# Altium PCB ads1299.PcbDoc (part 1 of 2)
Units mil, origin at the board's own origin, x right, y up, seen from the top; angles counter-clockwise.
Board outline 3937.01 x 3937.01 mil, 4 copper layers (Top Layer, internal_Layer 1, Internal_Layer 2, Bottom Layer), stack 23.756 mil thick; 175 components, 124 nets, 575 pads, 101 vias.
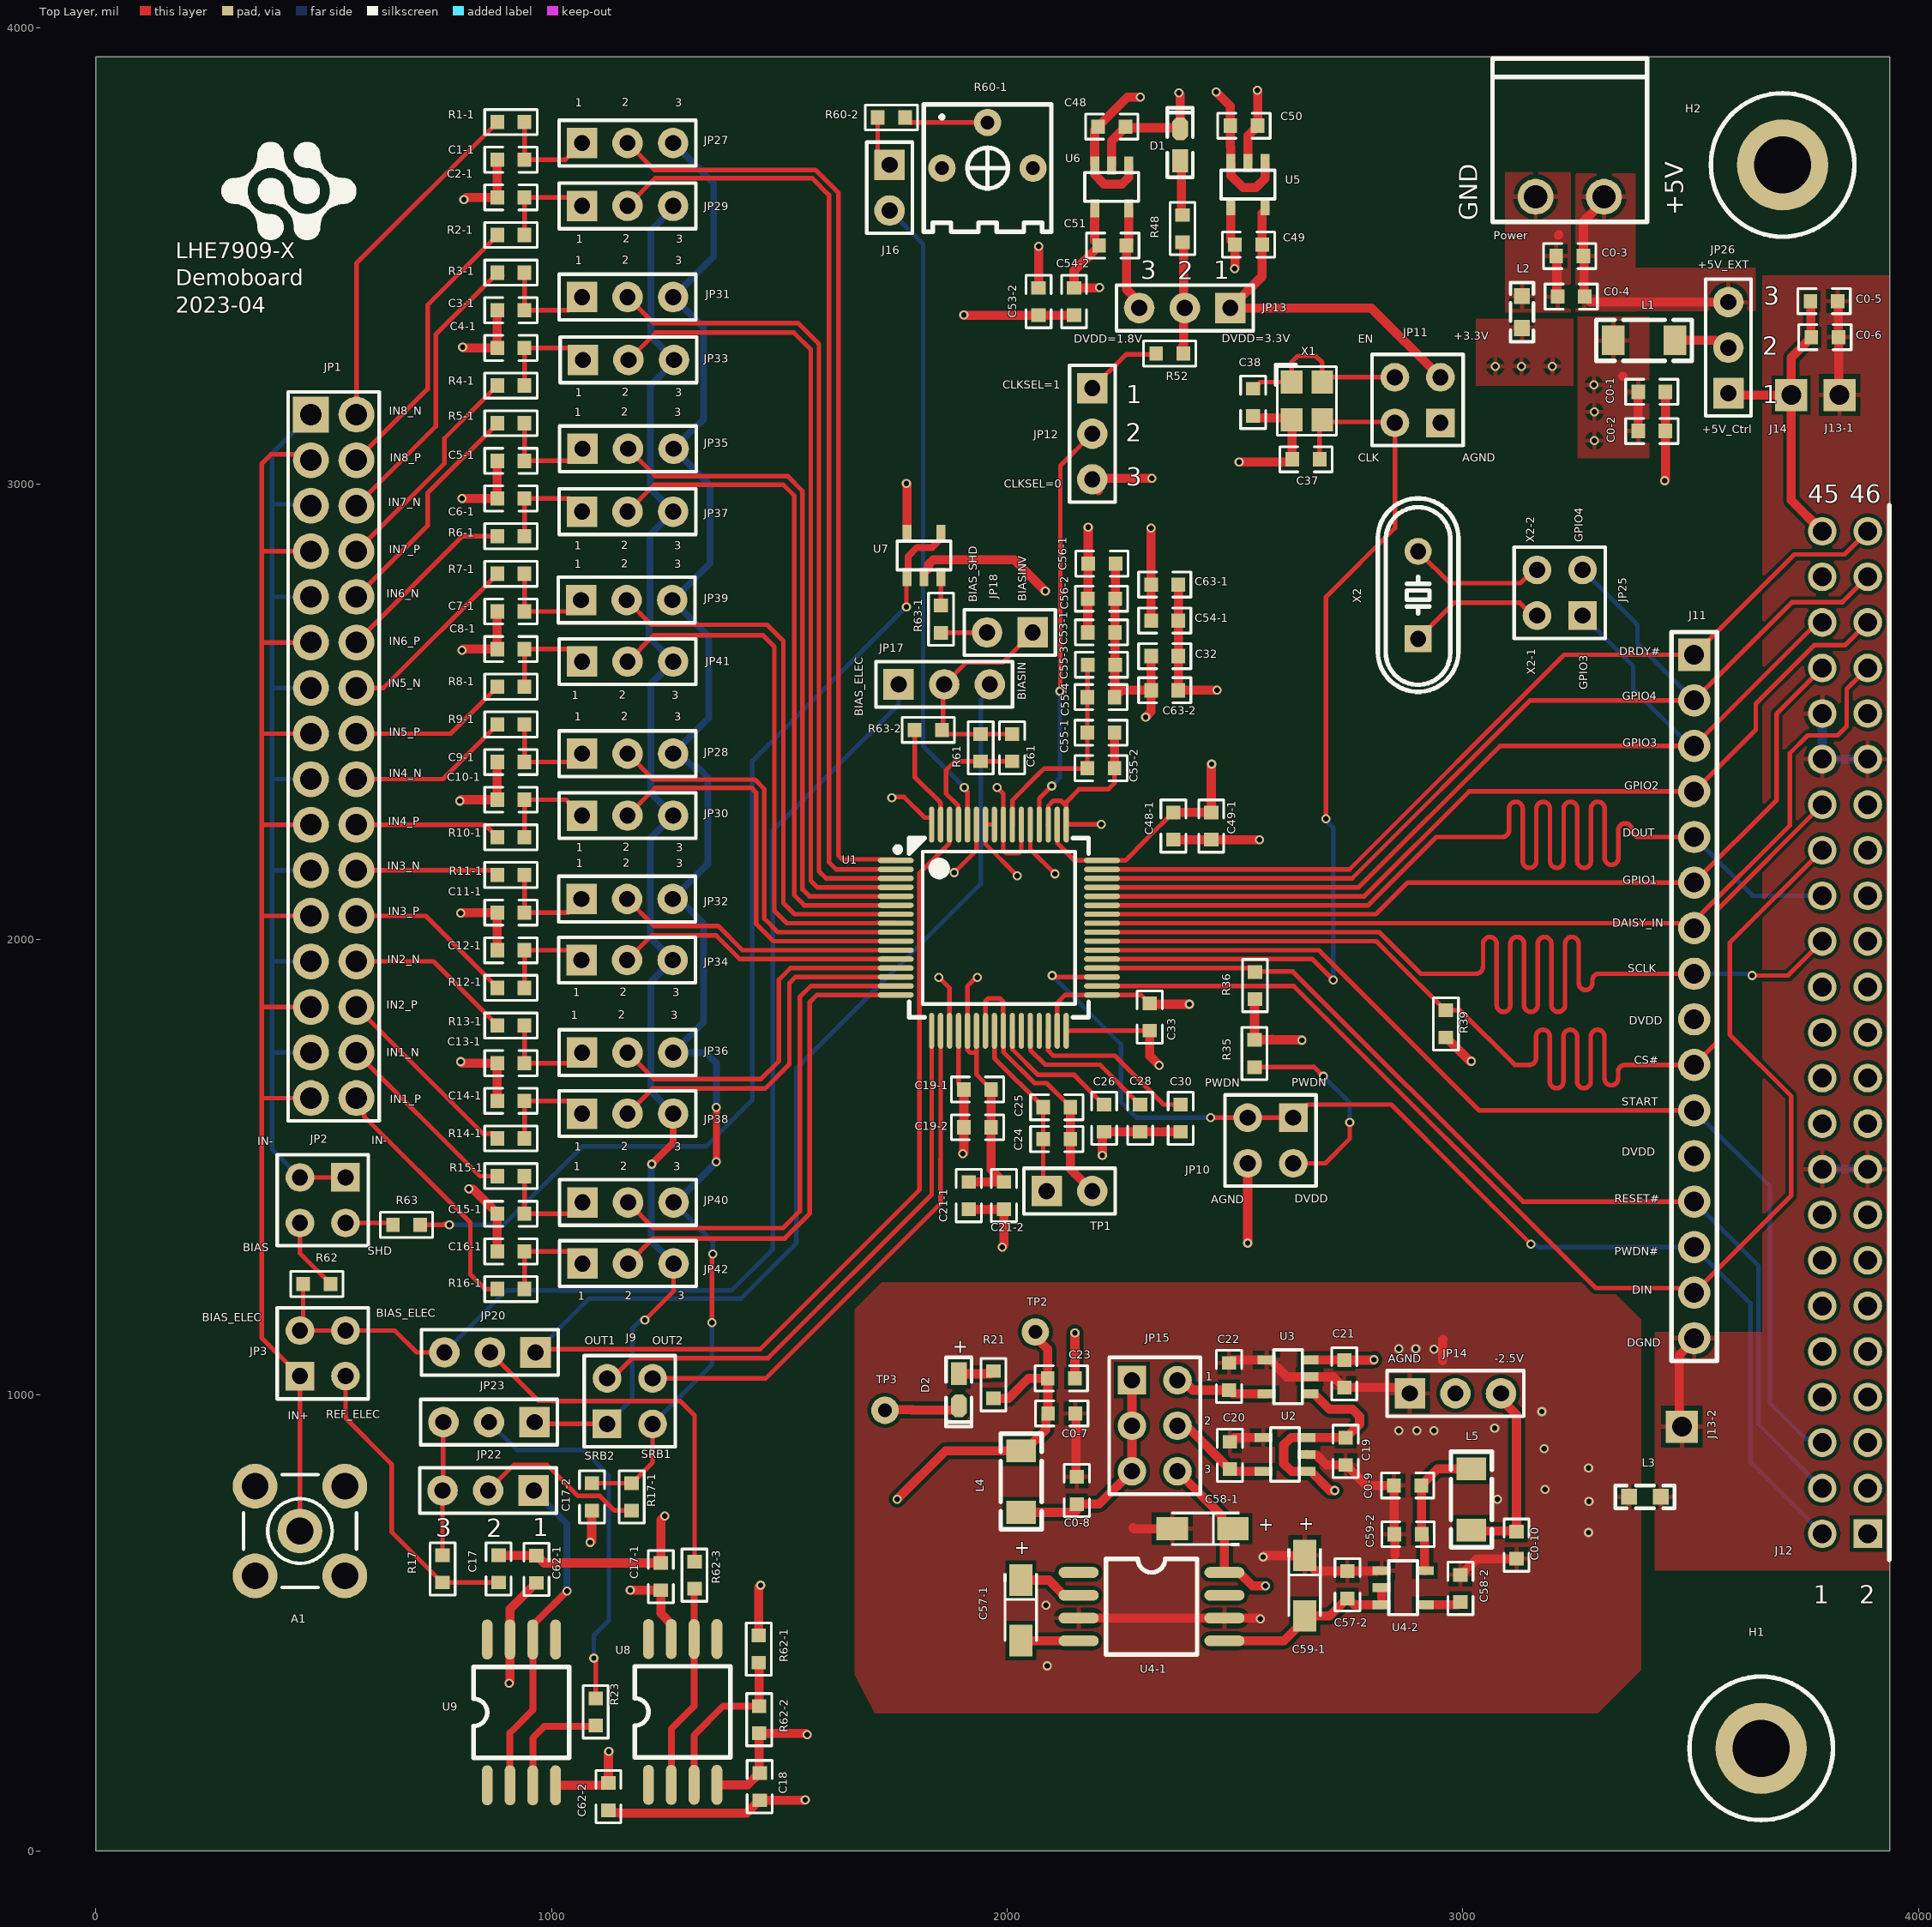
[diagram p0: Top Layer view]
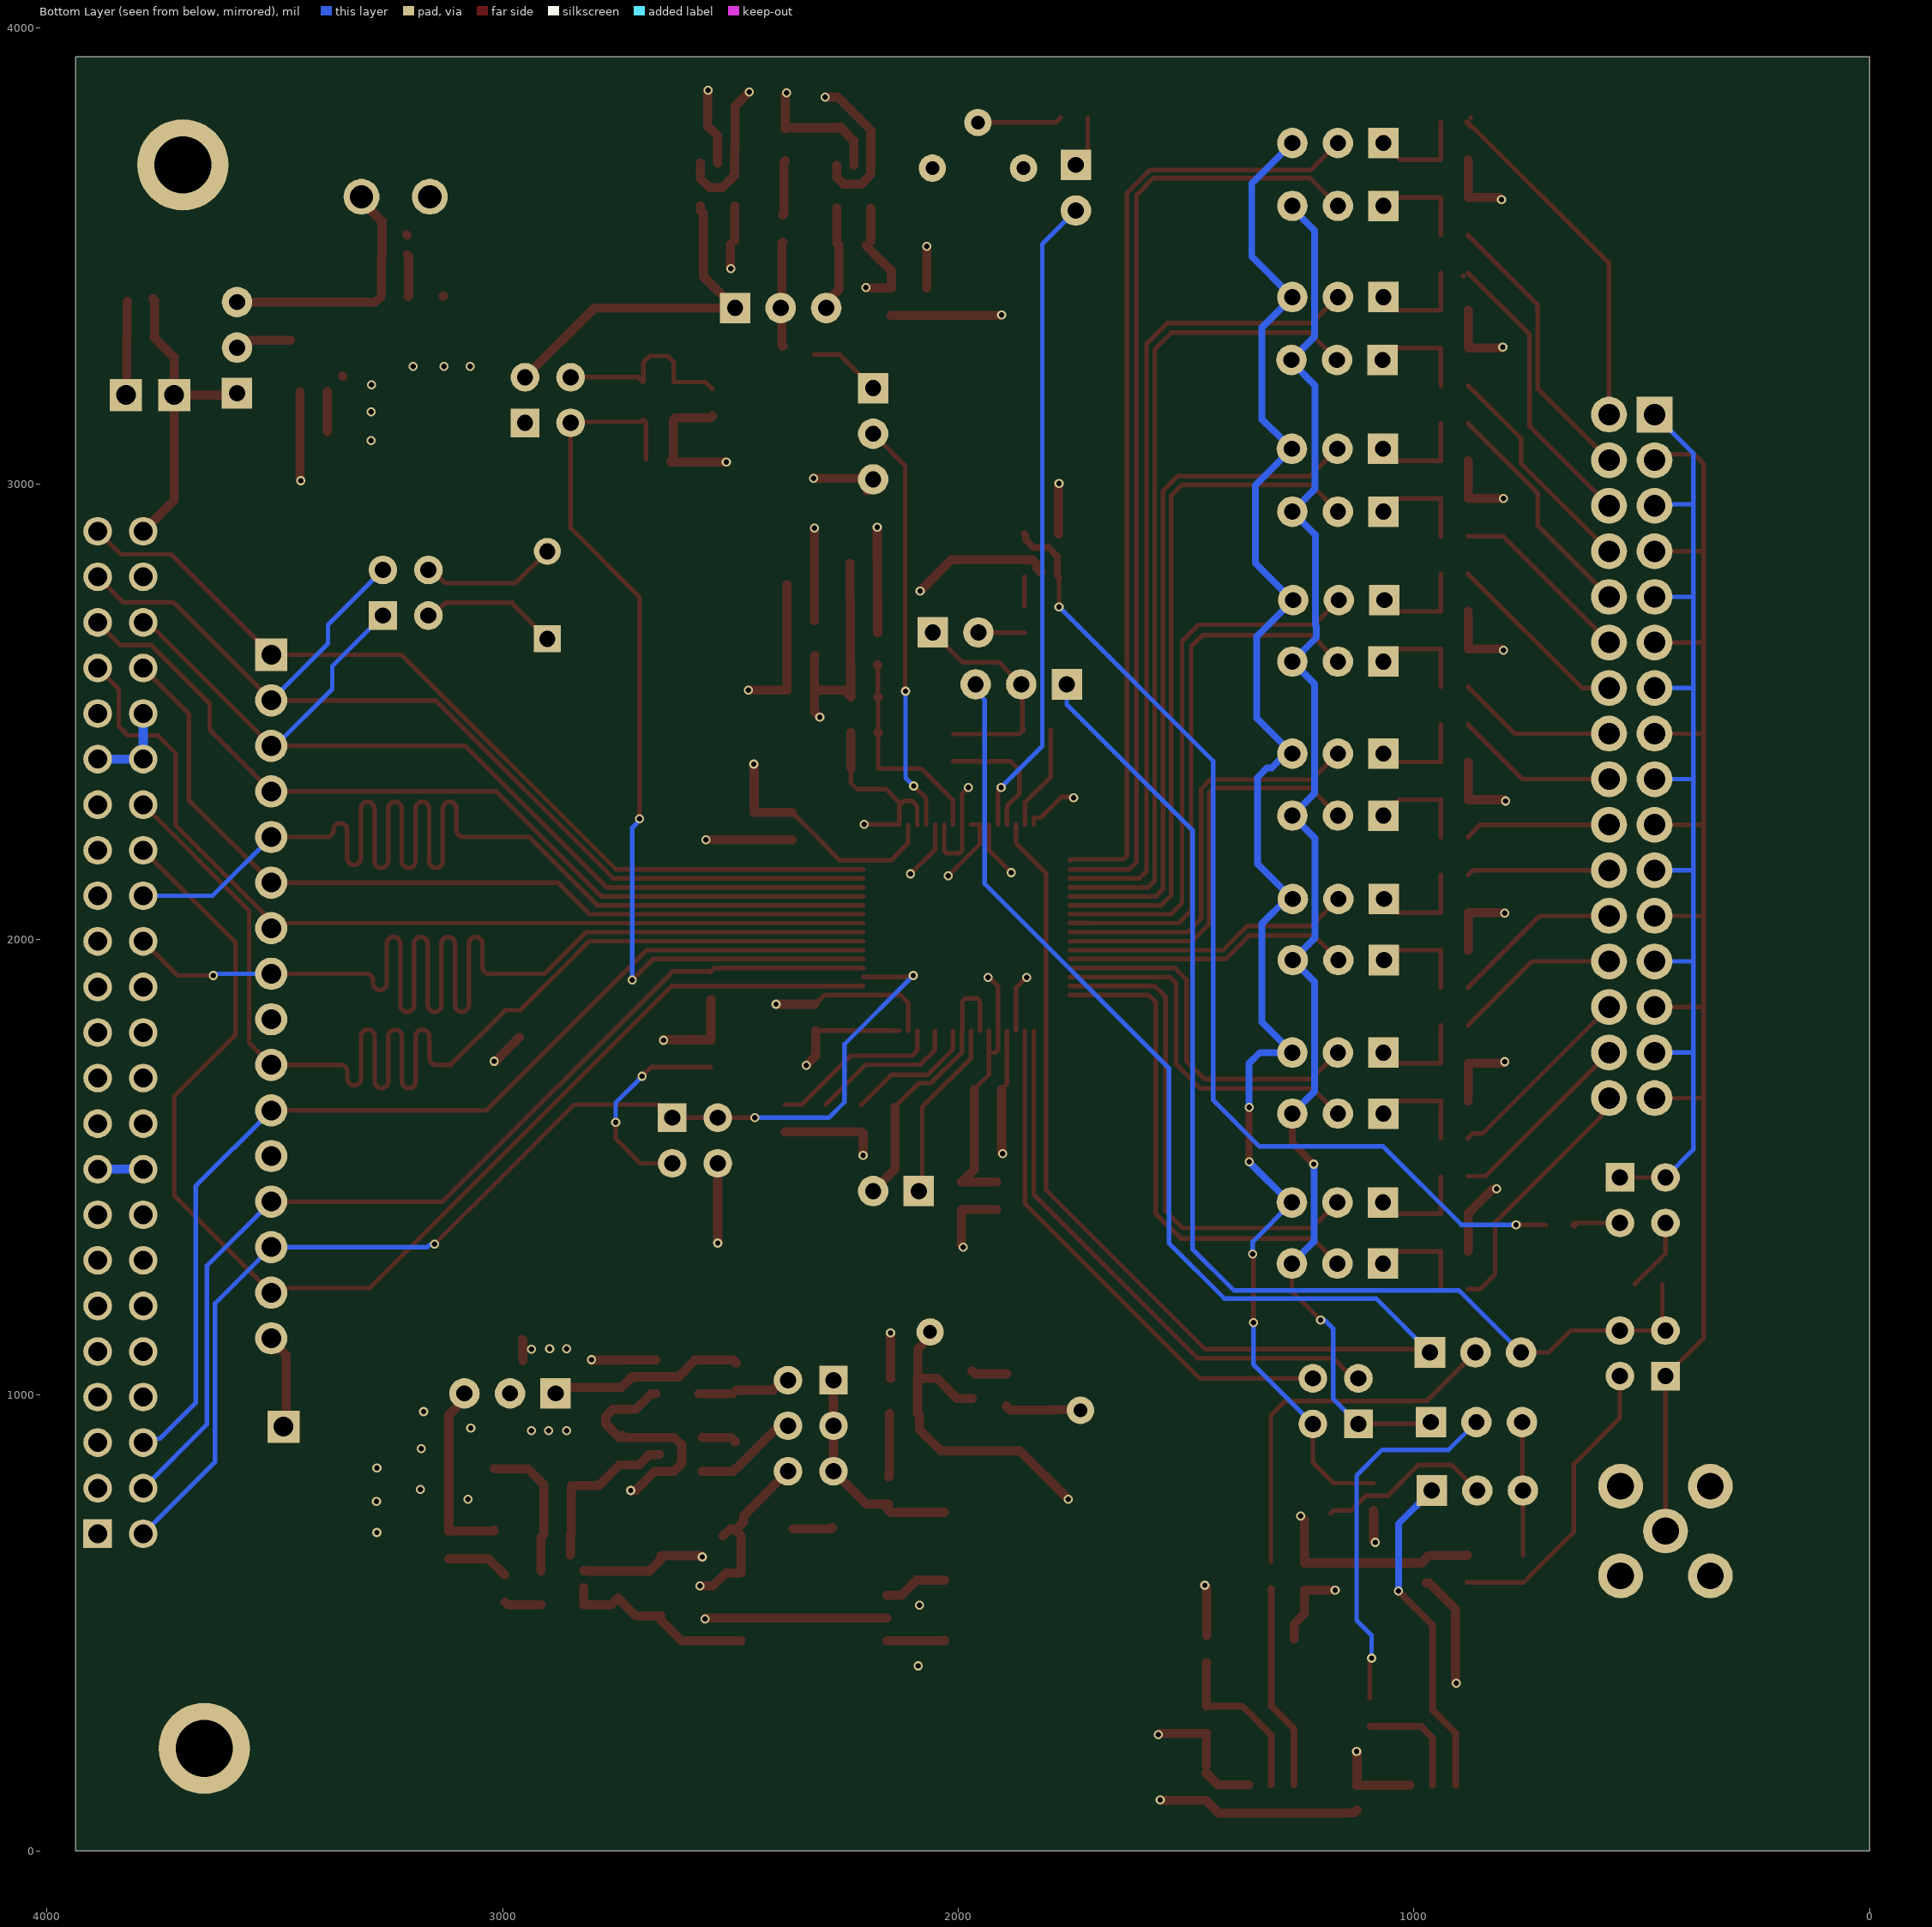
[diagram p1: Bottom Layer view, seen from below]
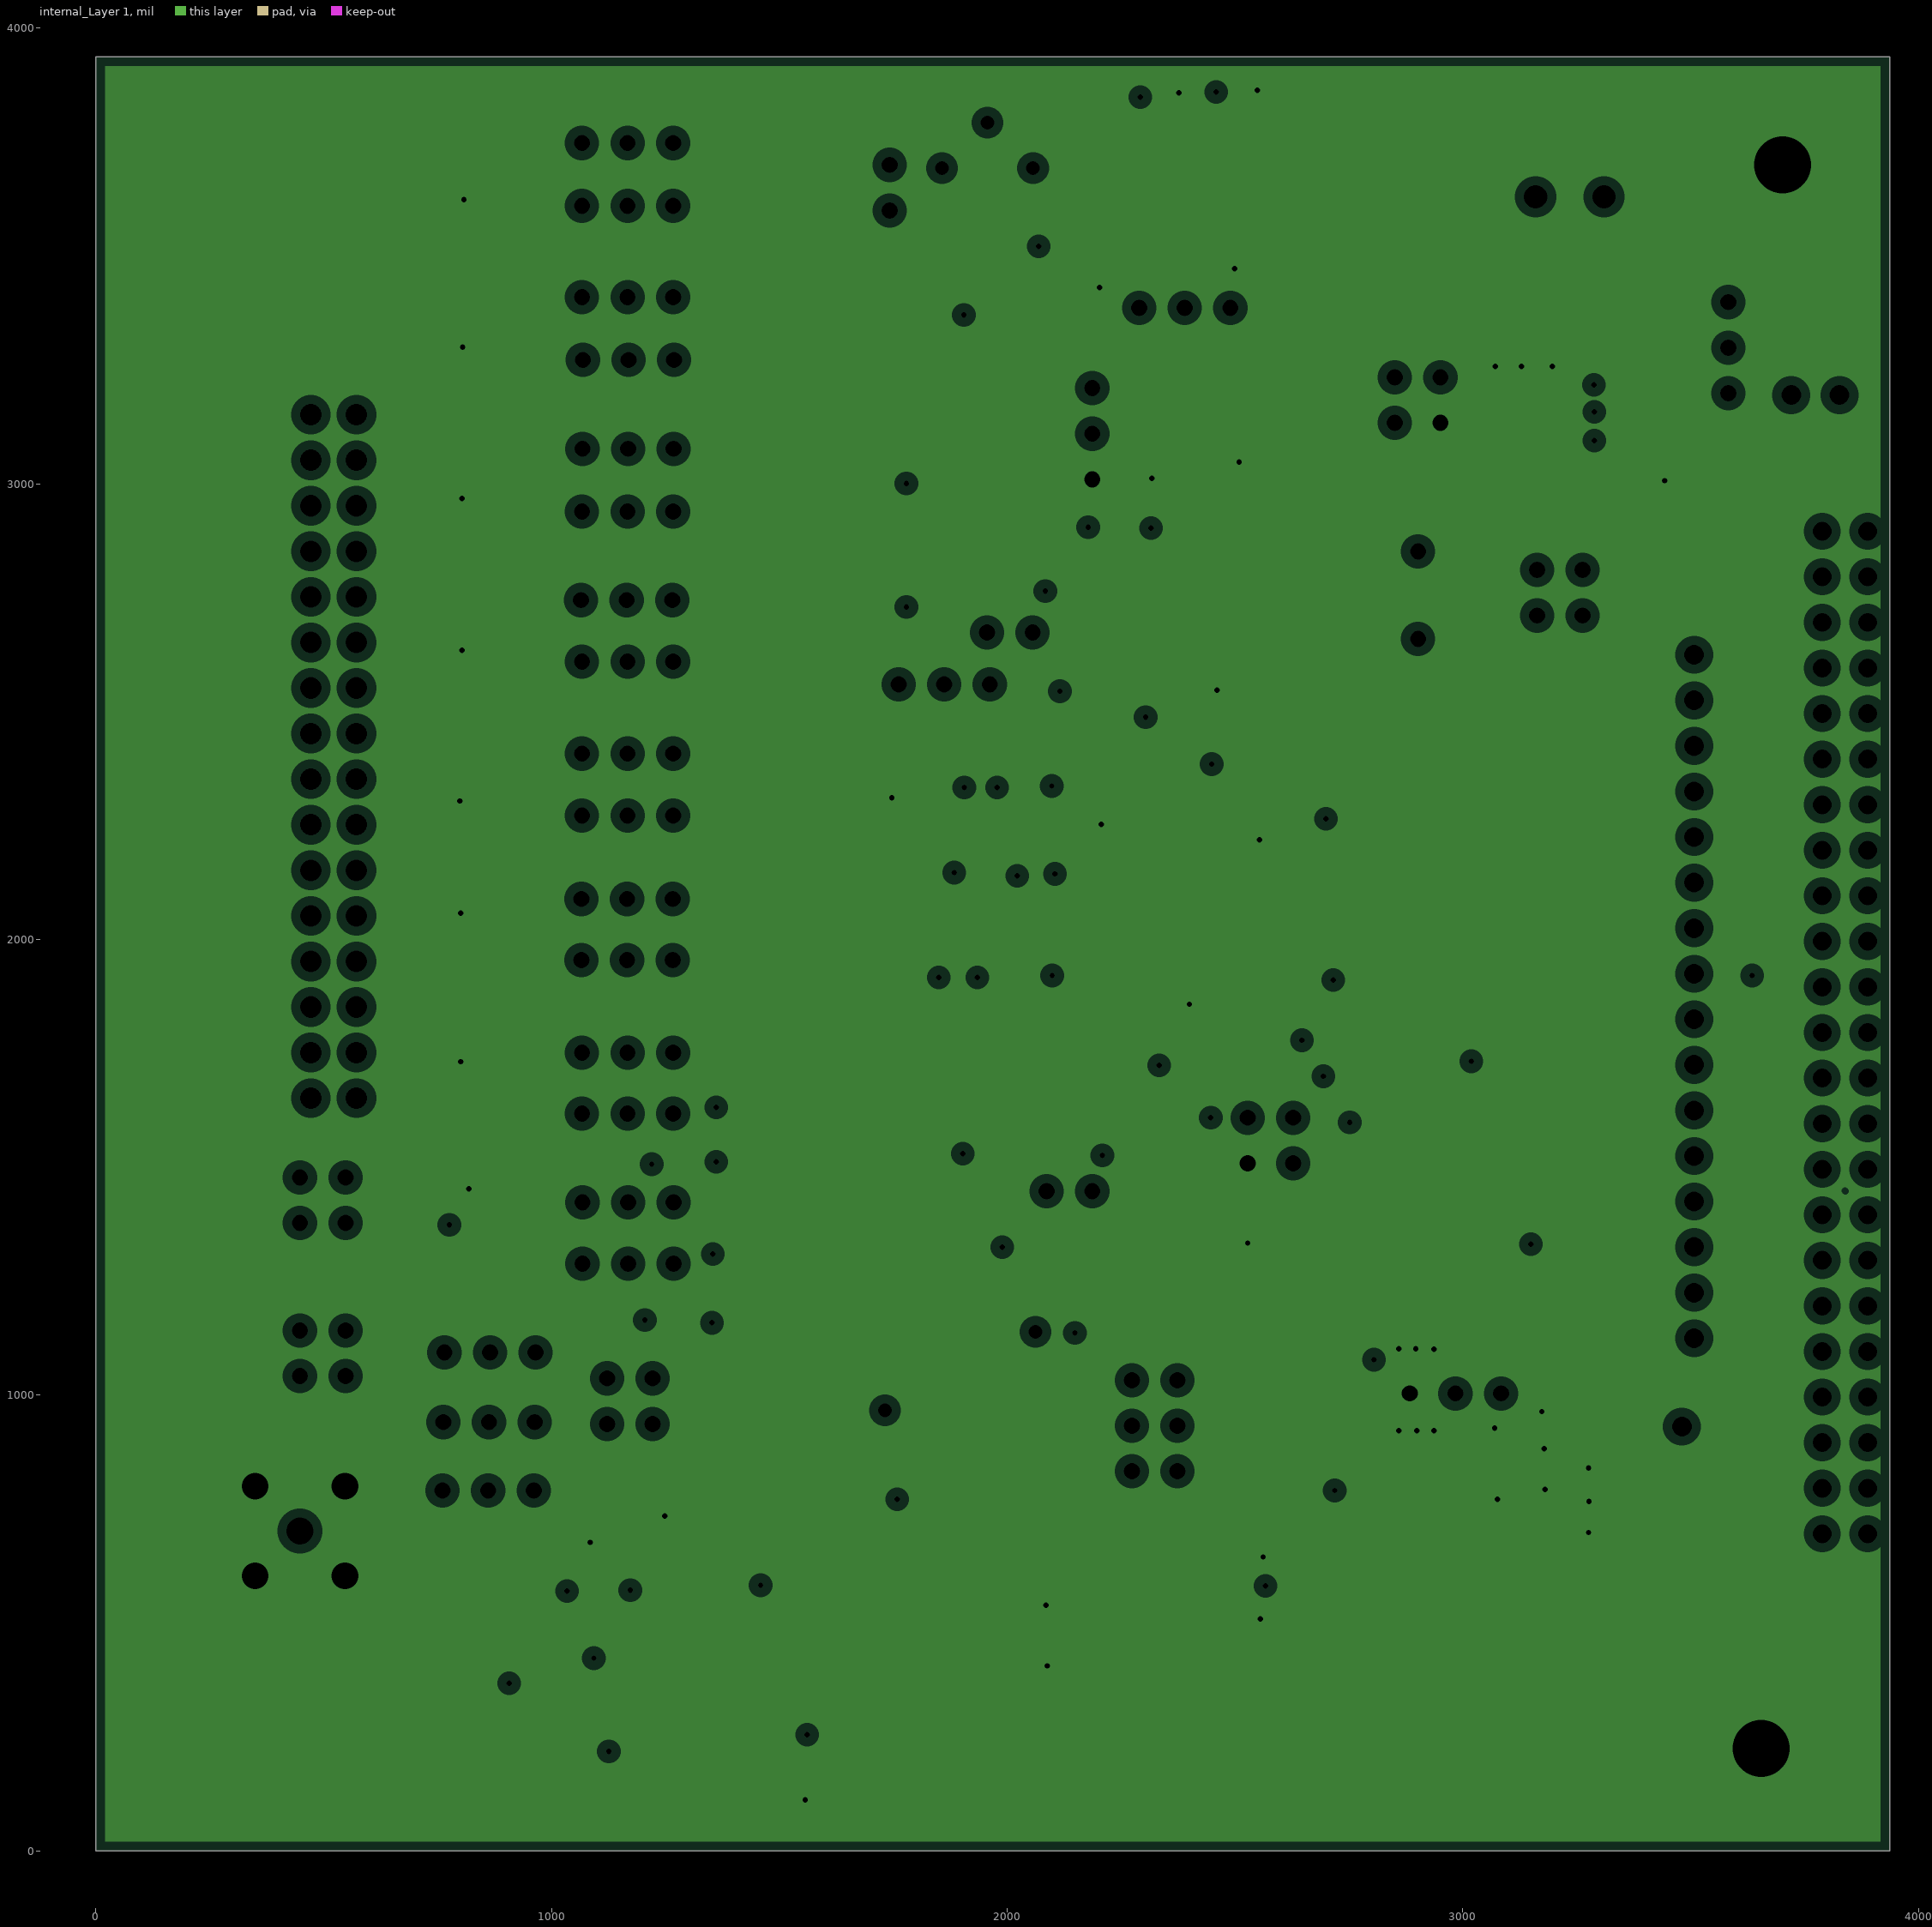
[diagram p2: internal_Layer 1, clearances drawn from the general rule]
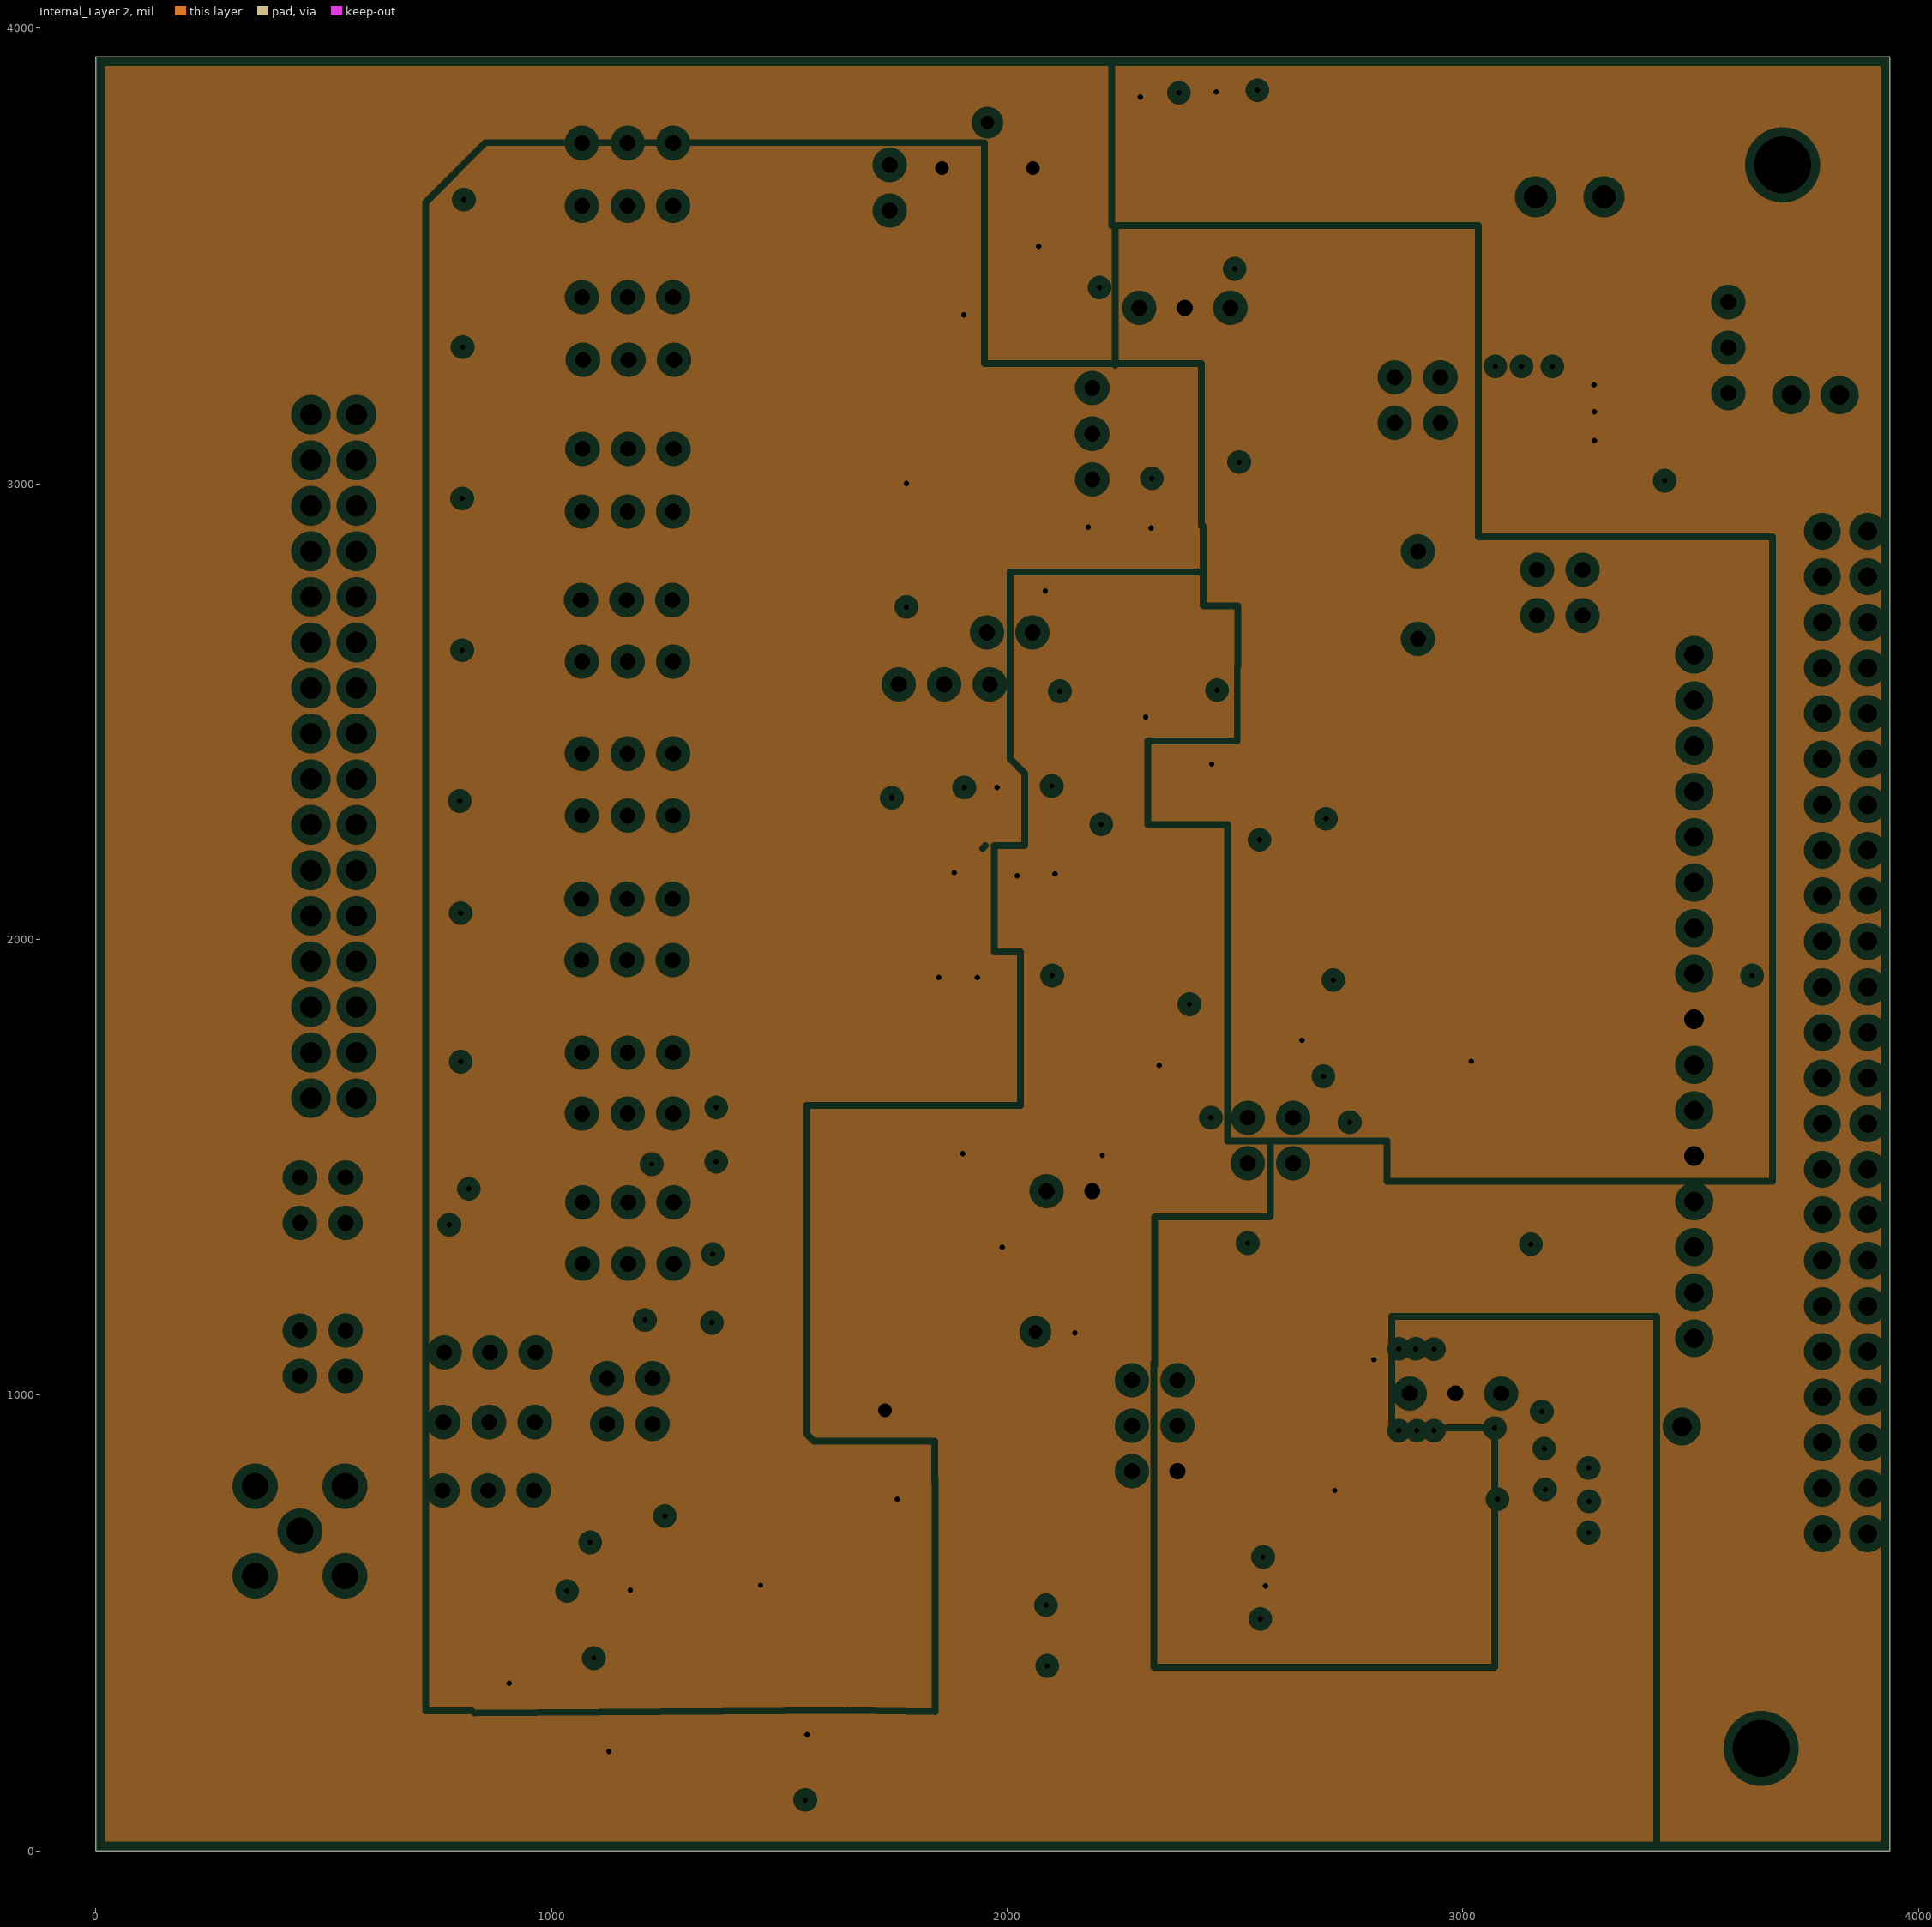
[diagram p3: Internal_Layer 2, clearances drawn from the general rule]

## Layer stack, top to bottom
Top Solder: solder mask 0.4, Solder Resist, Dk 3.5
Top Layer: signal copper 1.4
Dielectric 2: prepreg 2.8, PP-006, Dk 4.1
internal_Layer 1: plane copper 1.378, net AGND
Dielectric 1: dielectric 12.6, FR-4, Dk 4.8
Internal_Layer 2: plane copper 1.378, net (Multiple Nets)
Dielectric 3: prepreg 2.8, PP-006, Dk 4.1
Bottom Layer: signal copper 1.4
Bottom Solder: solder mask 0.4, Solder Resist, Dk 3.5

## Board outline
0,0 3937.01,0 3937.01,3937.01 0,3937.01

## Design rules (kind name [scope] priority, off if disabled: settings)
Clearance [All] p1: gap=8 ignorepadtopadclearanceinfootprint=TRUE except(0: Arc-Hole Track-Hole SMDPad-Hole THPad-Hole Via-Hole Fill-Hole Poly-Hole Region-Hole Text-Hole)
DiffPairsRouting [All] p1: maxlimit=10 minlimit=8 mostfreqgap=8 toplayer_minwidth=10 toplayer_maxwidth=15 toplayer_prefwidth=10 bottomlayer_minwidth=10 bottomlayer_maxwidth=15 bottomlayer_prefwidth=10 maxuncoupledlength=500
Height [All] p1: minheight=0 maxheight=5000 prefheight=500
HoleSize [All] p1: absolutevalues=TRUE maxlimit=200 minlimit=0 maxpercent=80.000 minpercent=20.000
HoleToHoleClearance [All] p1: gap=0 allowstackedmicrovias=TRUE
MatchedLengths [InNetClass('data')] p1: tolerance=10 checknetsindiffpair=FALSE checkdiffpairvsdiffpair=TRUE checkxsignals=TRUE checkothers=TRUE
MinimumSolderMaskSliver [All] p1: minsoldermaskwidth=0
PlaneClearance [All] p1: clearance=20
PlaneConnect [All] p1: planeconnectstyle=Relief reliefexpansion=20 reliefentries=4 reliefconductorwidth=10 reliefairgap=10
PolygonConnect [All] p1: thpad.connectstyle=Relief thpad.reliefconductorwidth=10 thpad.reliefentries=4 thpad.polygonreliefangle="90 Angle" thpad.airgapwidth=10 smdpad.connectstyle=Relief smdpad.reliefconductorwidth=10 smdpad.reliefentries=4 smdpad.polygonreliefangle="90 Angle" smdpad.airgapwidth=10 via.connectstyle=Direct via.reliefconductorwidth=10 via.reliefentries=4 via.polygonreliefangle="90 Angle" via.airgapwidth=10
RoutingVias [All] p1: holewidth=12 width=20 viastyle="Through Hole" minholewidth=12 minwidth=20 maxholewidth=12 maxwidth=20
SilkToSilkClearance [All] p1: silktosilkclearance=0
SilkToSolderMaskClearance [IsPad] p1: minsilkscreentomaskgap=0 clearancetoexposedcopper=TRUE
SolderMaskExpansion [All] p1: expansion=4
Width [InNetClass('All Nets')] p1: maxlimit=20 minlimit=10 preferedwidth=10 minimp=50.000000 maximp=50.000000 favimp=50.000000
21 further rules are at their usual default settings.

## Classes and differential pairs
component class ads1299_Regulators: C0-7 C0-8 C0-9 C0-10 C19 C20 C21 C22 C23 C48 C49 C50 C51 C57-1 C57-2 C58-1 C58-2 C59-1 C59-2 D1 D2 JP13 JP14 JP15 L4 L5 R21 R48 U2 U3 U4-1 U4-2 U5 U6
component class ads1299_main: C17-1 C17-2 C18 C19-1 C19-2 C21-1 C21-2 C24 C25 C26 C28 C30 C32 C33 C37 C38 C48-1 C49-1 C53-1 C53-2 C54-1 C54-2 C55-1 C55-2 C55-3 C55-4 C56-1 C56-2 C61 C62-1 C62-2 C63-1 C63-2 J9 J16 JP10 JP11 JP12 JP17 JP18 JP20 JP22 JP23 R17-1 R23 R35 R36 R39 R52 R60-1 R60-2 R61 R62-1 R62-2 R62-3 R63-1 R63-2 TP1 TP2 TP3 U1 U7 U8 U9 X1
component class ads1299_Interface: C0-1 C0-2 C0-3 C0-4 C0-5 C0-6 J11 J12 J13-1 J13-2 J14 JP25 JP26 L1 L2 L3 Power X2
component class ads1299_Ain: A1 C1-1 C2-1 C3-1 C4-1 C5-1 C6-1 C7-1 C8-1 C9-1 C10-1 C11-1 C12-1 C13-1 C14-1 C15-1 C16-1 C17 H1 H2 JP1 JP2 JP3 JP27 JP28 JP29 JP30 JP31 JP32 JP33 JP34 JP35 JP36 JP37 JP38 JP39 JP40 JP41 JP42 R1-1 R2-1 R3-1 R4-1 R5-1 R6-1 R7-1 R8-1 R9-1 R10-1 R11-1 R12-1 R13-1 R14-1 R15-1 R16-1 R17 R62 R63
differential pair IN8: +IN8_P -IN8_N
differential pair IN7: +IN7_P -IN7_N
differential pair IN6: +IN6_P -IN6_N
differential pair IN5: +IN5_P -IN5_N
differential pair IN4: +IN4_P -IN4_N
differential pair IN3: +IN3_P -IN3_N
differential pair IN2: +IN2_P -IN2_N
differential pair IN1: +IN1_P -IN1_N

## Components (designator, comment, footprint, x,y, rotation, side; value= is the part's Value field where it differs from the comment)
A1 "SMA/SMB" SMB_V-RJ45 448,702 r0 top
C0-1 "10uF" 0603C 3414.92,3202 r180 top
C0-2 "0.1uF" 0603C 3415,3116 r180 top
C0-3 "10uF" 0603C 3235,3500 r0 top
C0-4 "0.1uF" 0603C 3238,3411 r0 top
C0-5 "10uF" 0603C 3793.08,3401 r180 top
C0-6 "0.1uF" 0603C 3795,3322 r180 top
C0-7 "10uF" 0603C 2120,960 r180 top
C0-8 "10uF" 0603C 2153,790.92 r270 top
C0-9 "10uF" 0603C 2879.08,802 r0 top
C0-10 "10uF" 0603C 3118,671 r90 top
C1-1 "4.7nF" 0603C 911,3711.39 r0 top
C2-1 "4.7nF" 0603C 911,3628.77 r180 top
C3-1 "4.7nF" 0603C 911,3380.94 r0 top
C4-1 "4.7nF" 0603C 911,3298.32 r180 top
C5-1 "4.7nF" 0603C 911,3050.48 r0 top
C6-1 "4.7nF" 0603C 911,2967.87 r180 top
C7-1 "4.7nF" 0603C 911,2720.03 r0 top
C8-1 "4.7nF" 0603C 911,2637.42 r180 top
C9-1 "4.7nF" 0603C 911,2389.58 r0 top
C10-1 "4.7nF" 0603C 911,2306.97 r180 top
C11-1 "4.7nF" 0603C 911,2059.13 r0 top
C12-1 "4.7nF" 0603C 911,1976.52 r180 top
C13-1 "4.7nF" 0603C 911,1728.68 r0 top
C14-1 "4.7nF" 0603C 911,1646.06 r180 top
C15-1 "4.7nF" 0603C 911,1398.23 r0 top
C16-1 "4.7nF" 0603C 911,1315.61 r180 top
C17 "4.7nF" 0603C 884,619 r270 top
C17-1 "1uF" 0603C 1240,602 r270 top
C17-2 "NI" 0603C 1089,777 r90 top
C18 "1uF" 0603C 1457,141 r270 top
C19 "1uF" 0603C 2743,876.92 r90 top
C19-1 "1uF" 0603C 1935,1671 r0 top
C19-2 "0.1uF" 0603C 1935,1588 r0 top
C20 "1uF" 0603C 2489,867.92 r270 top
C21 "1uF" 0603C 2740,1047 r90 top
C21-1 "0.1uF" 0603C 1916,1438 r90 top
C21-2 "1uF" 0603C 1993,1438 r90 top
C22 "1uF" 0603C 2487,1041 r270 top
C23 "0.1uF" 0603C 2119,1037 r180 top
C24 "10uF" 0603C 2109,1562 r0 top
C25 "0.1uF" 0603C 2109,1632 r180 top
C26 "1uF" 0603C 2213,1608 r90 top
C28 "22uF/100uF" 0603C 2292,1608 r90 top
C30 "1uF" 0603C 2381,1608 r90 top
C32 "1uF" 0603C 2346,2622 r180 top
C33 "1uF" 0603C 2313,1830.08 r270 top
C37 "15pF" 0603C 2656,3054 r0 top
C38 "0.01uF" 0603C 2540,3178.92 r270 top
C48 "1uF" 0603C 2229.92,3784 r180 top
C48-1 "0.1uF" 0603C 2365,2249 r90 top
C49 "1uF" 0603C 2530,3525 r0 top
C49-1 "1uF" 0603C 2448,2249 r90 top
C50 "1uF" 0603C 2519.92,3786 r180 top
C51 "1uF" 0603C 2232,3523 r0 top
C53-1 "0.1uF" 0603C 2206.92,2674 r180 top
C53-2 "1uF" 0603C 2069,3400 r270 top
C54-1 "0.1uF" 0603C 2346,2700 r180 top
C54-2 "1uF" 0603C 2147,3400 r270 top
C55-1 "0.1uF" 0603C 2206,2454 r180 top
C55-2 "1uF" 0603C 2206,2376 r180 top
C55-3 "NI" 0603C 2207,2603 r0 top
C55-4 "NI" 0603C 2206,2532 r0 top
C56-1 "0.1uF" 0603C 2208,2825 r180 top
C56-2 "1uF" 0603C 2207,2748 r180 top
C57-1 "10uF" Tantalum_cap 2030,528 r270 top value=1uF
C57-2 "1uF" 0603C 2747,584 r270 top
C58-1 "0.1uF" Tantalum_cap 2429,707 r180 top value=1uF
C58-2 "1uF" 0603C 2995,576 r270 top
C59-1 "10uF" Tantalum_cap 2653,582 r270 top value=1uF
C59-2 "1uF" 0603C 2880,695 r0 top
C61 "0.01uF" 0603C 2011,2421 r270 top
C62-1 "1uF" 0603C 967,618 r270 top
C62-2 "1uF" 0603C 1125,119 r270 top
C63-1 "0.1uF" 0603C 2346,2779 r180 top
C63-2 "0.1uF" 0603C 2346,2547 r0 top
D1 "绿灯 0603" "LED 0603G" 2380,3744 r90 top
D2 "绿灯 0603" "LED 0603G" 1894,1012 r270 top
H1 "M3" M3x4_L 3655,225 r0 top
H2 "M3" M3x4_L 3702,3700 r0 top
J9 "Header 2X2" HDR2.54-LI-2x2P 1172,987 r0 top
J11 "KH-2.54PH180-1X16P-L11.5" HDR-TH_16P-P2.54 3508,1875 r270 top
J12 "X6521WR-2x23H-C30D60" HDR-TH_2x23P-P2.54-Bent 3839,1796 r90 top
J13-1 "Header_1P" HDR-TH_1P 3827,3195 r0 top
J13-2 "Header_1P" HDR-TH_1P 3481,931 r0 top
J14 "Header_1P" HDR-TH_1P 3721,3195 r0 top
J16 "Header_2P_2.54" HDR2.54-LI-2P 1742,3650 r270 top
JP1 "B-2100S32P-B110" HDR-TH_32P-P2.54-V-M-R2-C16-S2.54 522,2402 r270 top
JP2 "Header 2X2" HDR2.54-LI-2x2P 498,1428 r180 top
JP3 "Header 2X2" HDR2.54-LI-2x2P 498,1092 r0 top
JP10 "Header 2X2" HDR2.54-LI-2x2P 2578,1559 r180 top
JP11 "Header 2X2_2.54" HDR2.54-LI-2x2P 2901,3184 r90 top
JP12 "HDR-1X3" HDR2.54-LI-3P 2187,3110 r270 top
JP13 "HDR-1X3" HDR2.54-LI-3P 2390,3386 r180 top
JP14 "HDR-1X3" HDR2.54-LI-3P 2984,1004 r0 top
JP15 "Header 3X2" HDR2.54-LI-2x3P 2324,933 r270 top
JP17 "HDR-1X3" HDR2.54-LI-3P 1862,2560 r0 top
JP18 "Header_2P_2.54" HDR2.54-LI-2P 2006,2674 r180 top
JP20 "HDR-1X3" HDR2.54-LI-3P 865,1094 r180 top
JP22 "HDR-1X3" HDR2.54-LI-3P 861,791 r180 top
JP23 "HDR-1X3" HDR2.54-LI-3P 863,941 r180 top
JP25 "Header 2X2" HDR2.54-LI-2x2P 3213,2761 r90 top
JP26 "HDR-1X3" HDR2.54-LI-3P 3583,3299 r90 top
JP27 "HDR-1X3" HDR2.54-LI-3P 1167,3748 r0 top
JP28 "HDR-1X3" HDR2.54-LI-3P 1167,2408 r0 top
JP29 "HDR-1X3" HDR2.54-LI-3P 1167,3610 r0 top
JP30 "HDR-1X3" HDR2.54-LI-3P 1167,2272 r0 top
JP31 "HDR-1X3" HDR2.54-LI-3P 1167,3410 r0 top
JP32 "HDR-1X3" HDR2.54-LI-3P 1166,2089 r0 top
JP33 "HDR-1X3" HDR2.54-LI-3P 1169,3272 r0 top
JP34 "HDR-1X3" HDR2.54-LI-3P 1166,1955 r0 top
JP35 "HDR-1X3" HDR2.54-LI-3P 1168,3077 r0 top
JP36 "HDR-1X3" HDR2.54-LI-3P 1167,1752 r0 top
JP37 "HDR-1X3" HDR2.54-LI-3P 1167,2939 r0 top
JP38 "HDR-1X3" HDR2.54-LI-3P 1167,1618 r0 top
JP39 "HDR-1X3" HDR2.54-LI-3P 1165,2745 r0 top
JP40 "HDR-1X3" HDR2.54-LI-3P 1168,1423 r0 top
JP41 "HDR-1X3" HDR2.54-LI-3P 1167,2610 r0 top
JP42 "HDR-1X3" HDR2.54-LI-3P 1168,1289 r0 top
L1 "3.3uH" "L 1206" 3398,3315 r180 top
L2 "0Ω@100MHz" "L 0603" 3130,3377 r270 top
L3 "0Ω@100MHz" "L 0603" 3400,777 r0 top
L4 "3.3uH" "L 1206" 2031,810.5 r270 top
L5 "3.3uH" "L 1206" 3019,771 r270 top
Power "CONN-TH-F3.81-2P" CONN-TH_XY2500R-F-3.81-2P 3235,3630 r180 top
R1-1 "4.99kΩ" 0603R 911,3794 r0 top
R2-1 "4.99kΩ" 0603R 911,3546.16 r0 top
R3-1 "4.99kΩ" 0603R 911,3463.55 r0 top
R4-1 "4.99kΩ" 0603R 911,3215.71 r0 top
R5-1 "4.99kΩ" 0603R 911,3133.1 r0 top
R6-1 "4.99kΩ" 0603R 911,2885.26 r0 top
R7-1 "4.99kΩ" 0603R 911,2802.65 r0 top
R8-1 "4.99kΩ" 0603R 911,2554.81 r0 top
R9-1 "4.99kΩ" 0603R 911,2472.19 r0 top
R10-1 "4.99kΩ" 0603R 911,2224.35 r0 top
R11-1 "4.99kΩ" 0603R 911,2141.74 r0 top
R12-1 "4.99kΩ" 0603R 911,1893.9 r0 top
R13-1 "4.99kΩ" 0603R 911,1811.29 r0 top
R14-1 "4.99kΩ" 0603R 911,1563.45 r0 top
R15-1 "4.99kΩ" 0603R 911,1480.84 r0 top
R16-1 "4.99kΩ" 0603R 911,1233 r0 top
R17 "4.99kΩ" 0603R 761,619 r270 top
R17-1 "0Ω" 0603R 1176,777 r90 top
R21 "100Ω" 0603R 1970,1023 r270 top
R23 "0Ω" 0603R 1097,305 r270 top
R35 "10KΩ" 0603R 2543,1750 r270 top
R36 "10KΩ" 0603R 2544,1899 r270 top
R39 "10KΩ" 0603R 2963,1815 r90 top
R48 "100Ω" 0603R 2385,3560.08 r270 top
R52 "10KΩ" 0603R 2357,3286 r0 top
R60-1 "可变电阻10kΩ" RES-ADJ-TH_3362P 1957,3743 r0 top value=10kΩ
R60-2 "0Ω" 0603R 1746,3804 r180 top
R61 "392KΩ" 0603R 1942,2421 r90 top
R62 "4.99kΩ" 0603R 485,1244 r180 top
R62-1 "2MΩ" 0603R 1455,443 r90 top
R62-2 "2MΩ" 0603R 1456,288 r90 top
R62-3 "0Ω" 0603R 1314,605.08 r90 top
R63 "4.99kΩ" 0603R 682,1374 r0 top
R63-1 "0Ω/5kΩ" 0603R 1855,2703 r270 top
R63-2 "0Ω" 0603R 1827,2460 r0 top
TP1 "Header_2P_2.54" HDR2.54-LI-2P 2137,1448 r0 top
TP2 "测试点" TestPoint_Pad 2062,1139 r90 top
TP3 "测试点" TestPoint_Pad 1732,967 r180 top
U1 "ADS129x" LQFP-64 1982,2026 r270 top
U2 "LP5907MFX-3.0/NOPB" SOT23-5 2657,832.6 r90 top
U3 "LP5907MFX-2.5/NOPB" SOT23-5 2664,1003 r90 top
U4-1 "ICL7660M/TR" SOIC-8 2157,611 r0 top
U4-2 "TPS72325DBVR" SOT23-5 2822,615 r270 top
U5 "LP5907MFX-3.3/NOPB" SOT23-5 2566,3704 r180 top
U6 "LP5907MFX-1.8/NOPB" SOT23-5 2267,3699 r180 top
U7 "TLV9061IDBVR" SOT23-5 1780.2,2795.51 r0 top
U8 "OPA376AID" SOIC-8 1213,145 r90 top
U9 "OPA376AID" SOIC-8 859,144 r90 top
X1 "SX3M2.048M20F30TNN" "OSC 3225-4P" 2658,3182 r270 top value=2.048MHz
X2 "X49SD4096MSD2SC" HC-49US 2902,2756 r90 top value=4.096MHz

## Footprints (in the part's own frame and the unit in brackets; to place one, negate y for a bottom-side part, rotate by r counter-clockwise, add the part's x,y. Pads: shape width x height; smd on the part's side, far side on the other; paste and mask are expansions set on the pad)
0603C [mm]
  rect 0.76x0.8 smd: 1(-0.76,0) 2(0.76,0)
  silkscreen extent -1.46,-0.7 1.46,0.7, body extent -0.8,-0.4 0.8,0.4, height 0.3
0603R [mm]
  rect 0.76x0.8 smd: 1(-0.76,0) 2(0.76,0)
  silkscreen extent -1.46,-0.7 1.46,0.7, body extent -0.8,-0.41 0.8,0.41, height 0.45
CONN-TH_XY2500R-F-3.81-2P [mm]
  round 2 hole 1.3 mask+0.051: 1(-1.905,0) 2(1.905,0)
  silkscreen extent -4.31,-7.7 4.31,1.4
HC-49US [mm]
  rect 1.5x1.5 hole 0.9 mask+0.051: 1(-2.44,0)
  round 1.5 hole 0.9 mask+0.051: 2(2.44,0)
  silkscreen extent -5.39,-2.25 5.39,2.25
HDR2.54-LI-2P [mm] "排针，2脚"
  rect 1.7x1.7 hole 0.9: 1(-1.27,0)
  round 1.7 hole 0.9: 2(1.27,0)
  silkscreen extent -2.54,-1.27 2.54,1.27, body extent -2.54,-1.27 2.54,1.27, height 8.5
HDR2.54-LI-2x2P [mm] "双排排针，2x2脚"
  rect 1.6x1.6 hole 0.9: 1(-1.27,-1.27)
  round 1.6 hole 0.9: 2(-1.27,1.27) 3(1.27,-1.27) 4(1.27,1.27)
  silkscreen extent -2.54,-2.54 2.54,2.54, body extent -2.54,-2.54 2.54,2.54, height 8.5
HDR2.54-LI-2x3P [mm] "双排排针，3x2脚"
  rect 1.6x1.6 hole 0.9: 1(-2.54,-1.27)
  round 1.6 hole 0.9: 2(-2.54,1.27) 3(0,-1.27) 4(0,1.27) 5(2.54,-1.27) 6(2.54,1.27)
  silkscreen extent -3.81,-2.54 3.81,2.54, body extent -3.81,-2.54 3.81,2.54, height 8.5
HDR2.54-LI-3P [mm] "排针，3脚"
  rect 1.7x1.7 hole 0.9: 1(-2.54,0)
  round 1.7 hole 0.9: 2(0,0) 3(2.54,0)
  silkscreen extent -3.81,-1.27 3.81,1.27, body extent -3.81,-1.27 3.81,1.27, height 8.5
HDR-TH_1P [mm]
  rect 1.8x1.8 hole 1.1 mask+0.051: 1(0,0)
  body extent -1.27,-1.27 1.27,1.27, height 8.5
HDR-TH_2x23P-P2.54-Bent [mm]
  round 1.6 hole 1.05 mask+0.051: 1(-27.94,1.27) 3(-25.4,1.27) 4(-25.4,-1.27) 5(-22.86,1.27) 6(-22.86,-1.27) 7(-20.32,1.27) 8(-20.32,-1.27) 9(-17.78,1.27) 10(-17.78,-1.27) 11(-15.24,1.27) 12(-15.24,-1.27) 13(-12.7,1.27) 14(-12.7,-1.27) 15(-10.16,1.27) 16(-10.16,-1.27) 17(-7.62,1.27) 18(-7.62,-1.27) 19(-5.08,1.27) 20(-5.08,-1.27) 21(-2.54,1.27) 22(-2.54,-1.27) 23(0,1.27) 24(0,-1.27) 25(2.54,1.27) 26(2.54,-1.27) 27(5.08,1.27) 28(5.08,-1.27) 29(7.62,1.27) 30(7.62,-1.27) 31(10.16,1.27) 32(10.16,-1.27) 33(12.7,1.27) 34(12.7,-1.27) 35(15.24,1.27) 36(15.24,-1.27) 37(17.78,1.27) 38(17.78,-1.27) 39(20.32,1.27) 40(20.32,-1.27) 41(22.86,1.27) 42(22.86,-1.27) 43(25.4,1.27) 44(25.4,-1.27) 45(27.94,1.27) 46(27.94,-1.27)
  rect 1.6x1.6 hole 1.05 mask+0.051: 2(-27.94,-1.27)
  silkscreen extent -29.4,-2.47 29.4,-2.47, body extent -29.21,-11.07 29.21,1.78, height 5.1
HDR-TH_16P-P2.54 [mm]
  rect 1.8x1.8 hole 1.1 mask+0.051: 1(-19.05,0)
  round 1.8 hole 1.1 mask+0.051: 2(-16.51,0) 3(-13.97,0) 4(-11.43,0) 5(-8.89,0) 6(-6.35,0) 7(-3.81,0) 8(-1.27,0) 9(1.27,0) 10(3.81,0) 11(6.35,0) 12(8.89,0) 13(11.43,0) 14(13.97,0) 15(16.51,0) 16(19.05,0)
  silkscreen extent -20.32,-1.27 20.32,1.27, body extent -20.32,-1.27 20.32,1.27, height 8.5
HDR-TH_32P-P2.54-V-M-R2-C16-S2.54 [mm]
  rect 2x2 hole 1.2 mask+0.051: 1(-19.05,-1.27)
  round 2 hole 1.2 mask+0.051: 2(-19.05,1.27) 3(-16.51,-1.27) 4(-16.51,1.27) 5(-13.97,-1.27) 6(-13.97,1.27) 7(-11.43,-1.27) 8(-11.43,1.27) 9(-8.89,-1.27) 10(-8.89,1.27) 11(-6.35,-1.27) 12(-6.35,1.27) 13(-3.81,-1.27) 14(-3.81,1.27) 15(-1.27,-1.27) 16(-1.27,1.27) 17(1.27,-1.27) 18(1.27,1.27) 19(3.81,-1.27) 20(3.81,1.27) 21(6.35,-1.27) 22(6.35,1.27) 23(8.89,-1.27) 24(8.89,1.27) 25(11.43,-1.27) 26(11.43,1.27) 27(13.97,-1.27) 28(13.97,1.27) 29(16.51,-1.27) 30(16.51,1.27) 31(19.05,-1.27) 32(19.05,1.27)
  silkscreen extent -20.32,-2.54 20.32,2.54
"L 0603" [mil] "小功率贴片电感"
  rect 35x35 smd: 1(-35,0) 2(35,0)
  silkscreen extent -65,-25 65,25, body extent -31,-16 31,16, height 31
"L 1206" [mil] "小功率贴片电感"
  rect 50x65 smd: 1(-67.5,0) 2(67.5,0)
  silkscreen extent -105,-45 105,45, body extent -63,-31 63,32, height 22
"LED 0603G" [mil] "绿色0603LED"
  rect 50x35 smd: A(-35,0.26)
  oct 50x35 smd: K(35,0.26)
  silkscreen extent -71,-28 81,28, body extent -31,-16 32,16, height 18
LQFP-64 [mm]
  oval 0.3x2 smd mask+0.051: 1(-3.75,-5.75) 2(-3.25,-5.75) 3(-2.75,-5.75) 4(-2.25,-5.75) 5(-1.75,-5.75) 6(-1.25,-5.75) 7(-0.75,-5.75) 8(-0.25,-5.75) 9(0.25,-5.75) 10(0.75,-5.75) 11(1.25,-5.75) 12(1.75,-5.75) 13(2.25,-5.75) 14(2.75,-5.75) 15(3.25,-5.75) 16(3.75,-5.75) 33(3.75,5.75) 34(3.25,5.75) 35(2.75,5.75) 36(2.25,5.75) 37(1.75,5.75) 38(1.25,5.75) 39(0.75,5.75) 40(0.25,5.75) 41(-0.25,5.75) 42(-0.75,5.75) 43(-1.25,5.75) 44(-1.75,5.75) 45(-2.25,5.75) 46(-2.75,5.75) 47(-3.25,5.75) 48(-3.75,5.75)
  oval 2x0.3 smd mask+0.051: 17(5.75,-3.75) 18(5.75,-3.25) 19(5.75,-2.75) 20(5.75,-2.25) 21(5.75,-1.75) 22(5.75,-1.25) 23(5.75,-0.75) 24(5.75,-0.25) 25(5.75,0.25) 26(5.75,0.75) 27(5.75,1.25) 28(5.75,1.75) 29(5.75,2.25) 30(5.75,2.75) 31(5.75,3.25) 32(5.75,3.75) 49(-5.75,3.75) 50(-5.75,3.25) 51(-5.75,2.75) 52(-5.75,2.25) 53(-5.75,1.75) 54(-5.75,1.25) 55(-5.75,0.75) 56(-5.75,0.25) 57(-5.75,-0.25) 58(-5.75,-0.75) 59(-5.75,-1.25) 60(-5.75,-1.75) 61(-5.75,-2.25) 62(-5.75,-2.75) 63(-5.75,-3.25) 64(-5.75,-3.75)
  silkscreen extent -5,-5.79 5,5, body extent -6,-6 6,6, height 1.45
M3x4_L [mil] "M3铜柱，长：4mm"
  round 200 hole 125: 1(0,0)
  silkscreen extent -157,-157 157,157, body extent -106,-93 106,93, height 159
"OSC 3225-4P" [mm] "3.2*2.5*0.7mm(长宽高)"
  rect 1.3x1.2 smd: 1(-1.05,-0.85) 2(1.05,-0.85) 3(1.05,0.85) 4(-1.05,0.85)
  silkscreen extent -2.03,-1.75 1.91,1.65, body extent -1.6,-1.25 1.6,1.25, height 0.7
RES-ADJ-TH_3362P [mil]
  round 60 hole 30 mask+2: 1(-100,-50) 2(0,50) 3(100,-50)
  silkscreen extent -140,-190 140,90
SMB_V-RJ45 [mm] "Connector; SMB Straight"
  round 2.5 hole 1.5: 1(0,0) 2(-2.5,-2.5) 2(-2.5,2.5) 2(2.5,-2.5) 2(2.5,2.5)
  silkscreen extent -3.15,-3.15 3.15,3.15
SOIC-8 [mil]
  oval 88x24 smd: 1(0,0) 2(0,-50) 3(0,-100) 4(0,-150) 5(320,-150) 6(320,-100) 7(320,-50) 8(320,0)
  silkscreen extent 60,-180 260,30, body extent -5,-181 325,31, height 91
SOT23-5 [mm]
  rect 0.5x1 smd: 1(0,0) 2(0.95,0) 3(1.9,0) 4(1.9,2.4) 5(0,2.4)
  silkscreen extent -0.55,0.4 2.45,2, body extent -0.5,-0.2 2.4,2.6, height 1.09
Tantalum_cap [mil]
  rect 69.19x51.02 smd mask+2: 1(-66.39,0) 2(66.39,0)
  silkscreen extent -81,-37 66,37, body extent -63,-31 63,32, height 63
TestPoint_Pad [mil]
  round 60 hole 30: 1(0,0)

## Part data
A1: library part SMB, "SMB Straight Connector", LatestRevisionDate=17-Jul-2002, LatestRevisionNote="Re-released for DXP Platform.", Publisher="Altium Limited"
C0-1 C0-2 C0-3 C0-4 C0-5 C0-6 C0-7 C0-8 C0-9 C0-10 C1-1 C2-1 C3-1 C4-1 C5-1 C6-1 C7-1 C8-1 C9-1 C10-1 C11-1 C12-1 C13-1 C14-1 C15-1 C16-1 C17 C17-1 C17-2 C18 C19 C19-1 C19-2 C20 C21 C21-1 C21-2 C22 C23 C24 C25 C26 C28 C30 C32 C33 C37 C38 C48 C48-1 C49 C49-1 C50 C51 C53-1 C53-2 C54-1 C54-2 C55-1 C55-2 C55-3 C55-4 C56-1 C56-2 C57-2 C58-2 C59-2 C61 C62-1 C62-2 C63-1 C63-2: library part C, "Chip  Ceramic Capacitor"
  C0-1 C0-2 C0-3 C0-4 C0-5 C0-6 C0-7 C0-8 C0-9 C0-10 C1-1 C2-1 C3-1 C4-1 C5-1 C6-1 C7-1 C8-1 C9-1 C10-1 C11-1 C12-1 C13-1 C14-1 C15-1 C16-1 C17 C17-1 C18 C19 C19-1 C19-2 C20 C21 C22 C23 C24 C25 C26 C28 C30 C37 C38 C48 C49 C50 C51 C55-1 C55-2 C55-3 C55-4 C61 C62-1 C62-2 C63-1 C63-2: BOM名称=无极性, 学习资源=www.ooocke.
  C17-2 C21-1 C21-2 C32 C33 C48-1 C49-1 C53-1 C53-2 C54-1 C54-2 C56-1 C56-2 C57-2 C58-2 C59-2: BOM名称=无极性贴片电容, 学习资源=www.ooocke.com, 版权归属=源创客
C57-1 C58-1 C59-1: library part Tantalum_cap, Equivalent Series Resistance(ESR)=7.5Ω@100kHz, JLCPCB Part Class="Extended Part", LCSC Part Name="1uF ±10% 35V", Manufacturer="Kyocera AVX", Manufacturer Part=TAJA105K035RNJ, Operating Temperature=-55¡æ~+125¡, Rated Voltage=35V, Tolerance=±10%, Add into BOM=yes, Convert to PCB=yes, Datasheet=https://atta.szlcsc.com/upload/public/pdf/source/20160107/1457707748301.pdf, Device=TAJA105K035RNJ, Name=1uF, Supplier=LCSC, Supplier Footprint=CASE-A_3216, Supplier Part=C7176, Symbol=TAJA105K035RNJ
D1 D2: library part "0603 绿灯", "发光二极管", Package=0603, SuppliersPartNumber=C72043, ComponentLink1Description=供应商, ComponentLink1URL=http://www.szlcsc.com/product/details_73152.html, Supplier=LC
H1 H2: "铜柱孔", BOM名称=ͭ, 学习资源=https://shop463601444.taobao., 版权归属=封装库来自淘
J9 JP2 JP3 JP10 JP11 JP25: "Header, 2-Pin, Dual row", LatestRevisionDate=17-Jul-2002, LatestRevisionNote="Re-released for DXP Platform.", Publisher="Altium Limited"
J11: library part Header1x16, Color=ºÚÉ, Current Rating (Max)=3A, JLCPCB Part Class="Extended Part", LCSC Part Name="2.54mm 1x16P Ö±²å ·", Manufacturer=kinghelm(½ðº½±, Operating Temperature Range=-40¡æ~+105¡, Voltage Rating (Max)=-, Add into BOM=yes, Circluar Pins/Square Pins=·½Õ, Contact Material=-, Convert to PCB=yes, Datasheet=https://atta.szlcsc.com/upload/public/pdf/source/20211019/0B04AAAEA732E66331FBDF3E5963EEAF.pdf, Device=KH-2.54PH180-1X16P-L11.5, Insulation Height=2.5mm, Length of End Connection Pin=3mm, Length of Mating Pin=6mm, Manufacturer Part=KH-2.54PH180-1X16P-L11.5, Mounting Type=Ö±², Name=KH-2.54PH180-1X16P-L11.5, Number of Pins=16, Number of Rows=µ¥Å, Pin Structure=1x16P, Pitch=2.54mm, Row Spacing=-, Supplier=LCSC, Supplier Footprint=直插,P=2.54m, Supplier Part=C2905491, Symbol=KH-2.54PH180-1X16P-L11.5
J12: library part Header_2.54mm_2x23P_Bent, Color=ºÚÉ, Current Rating (Max)=3A, JLCPCB Part Class="Extended Part", LCSC Part Name="2.54mm 2x23P 弯插 方针 高镀", Manufacturer="XKB Connectivity(中国星", Operating Temperature Range=-40¡æ~+105¡, Voltage Rating (Max)=250V, Welding Temperature (Max)=260℃, Add into BOM=yes, Circluar Pins/Square Pins=·½Õ, Contact Material=»ÆÍ, Contact Plating=金, Convert to PCB=yes, Datasheet=https://atta.szlcsc.com/upload/public/pdf/source/20211009/B321D35F509179B46434BAB3052FF950.pdf, Device=X6521WR-2x23H-C30D60, Insulation Height=2.5mm, Length of End Connection Pin=-, Length of Mating Pin=6mm, Manufacturer Part=X6521WR-2x23H-C30D60, Mounting Type=Íä², Name=X6521WR-2x23H-C30D60, Number of Pins=46, Number of Rows=Ë«Å, Pin Structure=2x23P, Pitch=2.54mm, Row Spacing=2.54mm, Supplier=LCSC, Supplier Footprint=弯插,P=2.54m, Supplier Part=C725935, Symbol=X6521WR-2×23H-C30D60
J16 TP1: Color=ºÚÉ, Current Rating (Max)=-, JLCPCB Part Class="Extended Part", LCSC Part Name="2.54mm 1x2P Ö±²å ·", Manufacturer=MOLEX, Manufacturer Part=22284020, Add into BOM=yes, Circluar Pins/Square Pins=·½Õ, Contact Material=»ÆÍ, Contact Plating=-, Convert to PCB=yes, Datasheet=https://atta.szlcsc.com/upload/public/pdf/source/20180801/C234182_F77B1C2A9EF8AC9B34CEB7670B45930E.pdf, Device=22284020, Insulation Height=-, Length of Mating Pin=-, Mounting Type=Ö±², Name=22284020, Number of Pins=2, Number of Rows=1, Pin Structure=1x2P, Pitch=2.54mm, Row Spacing=-, Supplier=LCSC, Supplier Footprint=直插,P=2.54m, Supplier Part=C234182, Symbol=22-28-4020, Voltage Rating (Max)=-
JP1: library part Header2*16P, Color=ºÚÉ, Current Rating (Max)=-, JLCPCB Part Class="Extended Part", LCSC Part Name="2.54mm 2x16P Ö±²", Manufacturer=Ckmtw(²Ó¿ÆÃ, Operating Temperature Range=-40¡æ~+105¡, Add into BOM=yes, Circluar Pins/Square Pins=-, Contact Material=»ÆÍ, Contact Plating=-, Convert to PCB=yes, Datasheet=https://atta.szlcsc.com/upload/public/pdf/source/20170821/C124382_1503303309726901536.pdf, Device=B-2100S32P-B110, Insulation Height=2.54mm, Length of End Connection Pin=3mm, Length of Mating Pin=6mm, Manufacturer Part=B-2100S32P-B110, Mounting Type=Ö±², Name=B-2100S32P-B110, Number of Pins=32, Number of Rows=Ë«Å, Pin Structure=2x16P, Pitch=2.54mm, Row Spacing=2.54mm, Supplier=LCSC, Supplier Footprint=直插,P=2.54m, Supplier Part=C124382, Symbol="210S-2*16P L=11.6MMGold-plated black", Voltage Rating (Max)=-
JP12 JP13 JP14 JP17 JP20 JP22 JP23 JP27 JP28 JP29 JP30 JP31 JP32 JP33 JP34 JP35 JP36 JP37 JP38 JP39 JP40 JP41 JP42: library part "Header 3", "3P接插件"
  JP12 JP13 JP14 JP17 JP20 JP22 JP23: BOM名称=3P接, 学习资源=www.ooocke.
  JP27 JP28 JP29 JP30 JP31 JP32 JP33 JP34 JP35 JP36 JP37 JP38 JP39 JP40 JP41 JP42: BOM名称=3P接插件, 学习资源=www.ooocke.com, 版权归属=源创客
JP15: "Header, 3-Pin, Dual row", LatestRevisionDate=17-Jul-2002, LatestRevisionNote="Re-released for DXP Platform.", Publisher="Altium Limited"
JP18: Color=黑色, Current Rating (Max)=-, JLCPCB Part Class="Extended Part", LCSC Part Name="2.54mm 1x2P 直插 方针", Manufacturer=MOLEX, Manufacturer Part=22284020, Add into BOM=yes, Circluar Pins/Square Pins=方针, Contact Material=黄铜, Contact Plating=-, Convert to PCB=yes, Datasheet=https://atta.szlcsc.com/upload/public/pdf/source/20180801/C234182_F77B1C2A9EF8AC9B34CEB7670B45930E.pdf, Device=22284020, Insulation Height=-, Length of Mating Pin=-, Mounting Type=直插, Name=22284020, Number of Pins=2, Number of Rows=1, Pin Structure=1x2P, Pitch=2.54mm, Row Spacing=-, Supplier=LCSC, Supplier Footprint=直插,P=2.54mm, Supplier Part=C234182, Symbol=22-28-4020, Voltage Rating (Max)=-
JP26: library part "Header 3_1", "3P接插件", BOM名称=3P接, 学习资源=www.ooocke.
L1 L4 L5: library part "L 1206", "小功率贴片电感", BOM名称=小功率, 学习资源=www.ooocke.
L2 L3: library part CBW160808U000T, "磁珠", Current Rating=1A, DC Resistance=80mΩ, JLCPCB Part Class="Extended Part", LCSC Part Name="0¦¸@100MHz 0~15¦", Manufacturer=FH(风华, Tolerance=0~15Ω, Add into BOM=yes, Circuits=1, Convert to PCB=yes, Datasheet=https://atta.szlcsc.com/upload/public/pdf/source/20171102/C139173_15096094127801078754.pdf, Device=CBW160808U000T, Impedance @ Frequency=0Ω@100MHz, Manufacturer Part=CBW160808U000T, Name=CBW160808U000T, Supplier=LCSC, Supplier Footprint=0603, Supplier Part=C139173, Symbol=CBW160808U000T
R1-1 R2-1 R3-1 R4-1 R5-1 R6-1 R7-1 R8-1 R9-1 R10-1 R11-1 R12-1 R13-1 R14-1 R15-1 R16-1 R17 R17-1 R21 R23 R35 R36 R39 R48 R52 R60-2 R61 R62 R62-1 R62-2 R62-3 R63 R63-1 R63-2: library part R, "贴片电阻", BOM名称=ÌùÆ, 学习资源=www.ooocke.
R60-1: library part 3362P-1-103, JLCPCB Part Class="Extended Part", LCSC Part Name="10kΩ ±10", Manufacturer=BOCHEN(博晨, Tolerance=±10%, Add into BOM=yes, Convert to PCB=yes, Datasheet=https://atta.szlcsc.com/upload/public/pdf/source/20171114/C118956_15106326650691117445.pdf, Device=3362P-1-103, Manufacturer Part=3362P-1-103, Name=10kΩ, Supplier=LCSC, Supplier Footprint=²å¼, Supplier Part=C118956, Symbol=3362P-1-103_C118956
TP2 TP3: library part TestPoint
U1: "ECG,EEG", Manufacturer_Part_Number=ADS131E08SPAG, Mfr_Name="Texas Instruments", Copyright="Copyright (C) 2022 Ultra Librarian. All rights reserved.", RefDes=RefDes, Type=DEV
U2 U3 U6: library part LP5907MFX-3.3/NOPB, Dropout Voltage=250mV@(250mA), JLCPCB Part Class="Extended Part", LCSC Part Name="Vin=5.5V Vout=3.3V 250mA 90dB@(100Hz),60dB@(100kHz)", Manufacturer=TI(德州仪, Maximum Input Voltage=5.5V, Output Current=250mA, Output Voltage=3.3V, Power Supply Rejection Ratio (PRSS)=90dB@(100Hz),60dB@(100kHz), Add into BOM=yes, Convert to PCB=yes, Datasheet=https://atta.szlcsc.com/upload/public/pdf/source/20160830/1472551528598.pdf, Device=LP5907MFX-3.3/NOPB, Manufacturer Part=LP5907MFX-3.3/NOPB, Name=LP5907MFX-3.3/NOPB, Number of Outputs=1, Output Polarity=正, Output Type=¹Ì¶, Supplier=LCSC, Supplier Footprint=SOT-23-5, Supplier Part=C80670, Symbol=LP5907MFX-3.3/NOPB
U4-1: JLCPCB Part Class="Extended Part", Manufacturer=HGSEMI(华冠, Add into BOM=yes, Convert to PCB=yes, Datasheet=https://atta.szlcsc.com/upload/public/pdf/source/20220223/B7DC69E53F1DD57A8AF8717E7604F527.pdf, Device=ICL7660M/TR, LCSC Part Name=ICL7660M/TR, Manufacturer Part=ICL7660M/TR, Name=ICL7660M/TR, Supplier=LCSC, Supplier Footprint=SOP-8, Supplier Part=C356724, Symbol=ICL7660M/TR
U4-2: Dropout Voltage=500mV@(200mA), JLCPCB Part Class="Extended Part", LCSC Part Name="负 Vin=10V Vout=2.5V 200mA 65dB", Manufacturer=TI(德州仪器), Maximum Input Voltage=10V, Output Current=200mA, Output Voltage=2.5V, Power Supply Rejection Ratio (PSRR)=65dB, Add into BOM=yes, Convert to PCB=yes, Datasheet=https://atta.szlcsc.com/upload/public/pdf/source/20171113/C69932_15105675558771116637.pdf, Device=TPS72325DBVR, Manufacturer Part=TPS72325DBVR, Name=TPS72325DBVR, Number of Outputs=1, Output Polarity=负, Output Type=固定, Supplier=LCSC, Supplier Footprint=SOT-23-5, Supplier Part=C69932, Symbol=TPS72325DBVR
U5: Dropout Voltage=250mV@(250mA), JLCPCB Part Class="Extended Part", LCSC Part Name="Vin=5.5V Vout=3.3V 250mA 90dB@(100Hz),60dB@(100kHz)", Manufacturer=TI(德州仪, Maximum Input Voltage=5.5V, Output Current=250mA, Output Voltage=3.3V, Power Supply Rejection Ratio (PRSS)=90dB@(100Hz),60dB@(100kHz), Add into BOM=yes, Convert to PCB=yes, Datasheet=https://atta.szlcsc.com/upload/public/pdf/source/20160830/1472551528598.pdf, Device=LP5907MFX-3.3/NOPB, Manufacturer Part=LP5907MFX-3.3/NOPB, Name=LP5907MFX-3.3/NOPB, Number of Outputs=1, Output Polarity=正, Output Type=¹Ì¶, Supplier=LCSC, Supplier Footprint=SOT-23-5, Supplier Part=C80670, Symbol=LP5907MFX-3.3/NOPB
U7: JLCPCB Part Class="Extended Part", Manufacturer=TI(德州仪, Operating Temperature=-, Add into BOM=yes, Amplifier Type=-, Convert to PCB=yes, Datasheet=https://atta.szlcsc.com/upload/public/pdf/source/20190614/C398358_49FE9762020E71441728160F646E231F.pdf, Device=TLV9061IDBVR, Iq per channel (Typ)=-, LCSC Part Name=TLV9061IDBVR, Manufacturer Part=TLV9061IDBVR, Name=TLV9061IDBVR, Number of Circuits=-, Output Type=-, Supplier=LCSC, Supplier Footprint=SOT-23-5, Supplier Part=C398358, Symbol=TLV9061IDBVR
U8 U9: JLCPCB Part Class="Extended Part", Manufacturer=TI(德州仪, Add into BOM=yes, Convert to PCB=yes, Datasheet=https://atta.szlcsc.com/upload/public/pdf/source/20210701/9FC12D00E1332600214DE3C63939EFF5.pdf, Device=OPA376AID, LCSC Part Name=OPA376AID, Manufacturer Part=OPA376AID, Name=OPA376AID, Supplier=LCSC, Supplier Footprint=SOIC-8, Supplier Part=C1347528, Symbol=OPA376AID
X1: Frequency Stability=±20ppm, JLCPCB Part Class="Extended Part", LCSC Part Name="2.048MHz ±20ppm 1.62V~3.63V CMOS", Manufacturer=SCTF(星通时, Operating Temperature=-40¡æ~+85¡, Supply Current (Max)=10mA, Supply Voltage=1.62V~3.63V, Add into BOM=yes, Convert to PCB=yes, Datasheet=https://atta.szlcsc.com/upload/public/pdf/source/20211009/2941C931EA31459006A6A1B668A18381.pdf, Device=SX3M2.048M20F30TNN, Manufacturer Part=SX3M2.048M20F30TNN, Name=2.048MHz, Output Type=CMOS, Supplier=LCSC, Supplier Footprint=SMD3225-4P, Supplier Part=C2901549, Symbol=SX3M2.048M20F30TNN
X2: library part "Passive Oscillator", Frequency Stability=±30ppm, Frequency Tolerance=±20ppm, JLCPCB Part Class="Extended Part", LCSC Part Name="HC-49US 4.096MHz ±20ppm 20pF", Load Capacitance=20pF, Manufacturer=YXC(扬兴晶, Manufacturer Part=X49SD4096MSD2SC-1, Operating Temperature=-20¡æ~+70¡, Add into BOM=yes, Convert to PCB=yes, Crystal Type=49S¾§Õ, Datasheet=https://atta.szlcsc.com/upload/public/pdf/source/20210903/A997D130AE99CBB55D9024F9BE6DA174.pdf, Device=X49SD4096MSD2SC-1, Name=4.096MHz, Supplier=LCSC, Supplier Footprint=HC-49S, Supplier Part=C2226, Symbol=X49SD4096MSD2SC-1

## Via types
v1: diameter 20, hole 12, Top Layer to Bottom Layer, tented both sides, 86 vias
v2: diameter 20, hole 12, Top Layer to Bottom Layer, 15 vias

## Nets (pads, with @x,y where several pads share a name; then routed paths per layer and width w, separated by ;. In a path a pad name is that pad's centre, name@x,y a point inside that pad or via, vN(x,y) a via of type N, cw(c..) or ccw(c..) an arc to the next point about the centre after c; other vN are vias at no path point)
5V_Select: JP26.2 L1.1 | length 124.1
  Top Layer w20: L1.1@3465.5,3315 3554.3,3315 3570.3,3299 JP26.2@3583,3299
+1.8V: C51.2 JP13.3 U6.5 | length 232.2
  Top Layer w20: U6.5@2267,3604.51 2267,3528.87 2261.92,3523.79 C51.2@2261.92,3523 2261.92,3426.78 2290,3398.7 JP13.3@2290,3386
+2.5V: C22.2 JP15.2 U3.5 | length 195.7
  Top Layer w20: JP15.2@2374,1033 2385.63,1033 2407.55,1011.08 C22.2@2487,1011.08 ; C22.2@2495.87,1003 U3.5@2569.51,1003
+3.0V: C20.2 JP15.4 U2.5 | length 230.1
  Top Layer w20: JP15.4@2374,933 2382.23,924.77 2401.44,924.77 2488.21,838 C20.2@2489,838 2489.79,838 2495.19,832.6 U2.5@2562.51,832.6
+3.3V: C49.2 JP11.3 JP13.1 U5.5 | length 779
  Top Layer w20: U5.5@2566,3609.51 2566,3599.98 2559.92,3593.91 C49.2@2559.92,3525 2559.92,3455.92 JP13.1@2490,3386 2799,3386 JP11.3@2951,3234
+5V: C0-1.2 C0-2.2 C19.2 C21.2 C48.2 C50.2 C58-1.1 JP15.6 L1.2 U2.1 U2.3 U3.1 U3.3 U4-1.8 U5.1 U5.3 U6.1 U6.3 | length 1818
  Top Layer w20: C48.2@2192.2,3775.41 U6.3@2192.2,3699 2192.35,3698.84 2192.35,3678.43 2212.79,3658 2252,3658 2266.84,3672.84 2266.84,3698.84 U6.1@2267,3699 ; C48.2@2200,3784 2200,3784.79 2264.21,3849 v1(2292,3849) ; JP15.6@2374,833 2470.79,736.21 2470.79,722.51 2486.31,707 C58-1.1@2492.51,707 ; v1(2459,3860) 2490,3829 C50.2@2490,3786 2490,3740.25 2491.04,3739.21 2491.04,3704.16 U5.3@2491.2,3704 2491.35,3703.84 2491.35,3676.65 2518,3650 2546,3650 2565.84,3669.84 2565.84,3703.84 U5.1@2566,3704 ; C58-1.1@2516,691.49 2500.49,707 C58-1.1@2495.39,707 C58-1.1@2492.51,707 ; v1(2567.3,581.3) 2538.7,581.3 2510.31,609.69 2478.31,609.69 U4-1.8@2477,611 2477,691.49 C58-1.1@2492.51,707 ; U3.1@2664,1003 2673.53,1003 2707.35,969.18 2757.82,969.18 2773.69,953.31 2773.69,936.74 2743.79,906.84 C19.2@2743,906.84 C19.2@2742.6,907.24 ; U3.3@2664,1077.8 2664.16,1077.65 2739.28,1077.65 C21.2@2740,1076.92 2803.92,1076.92 v1(2805,1078) ; v1(2719,791) 2708.13,791 2666.53,832.6 U2.1@2657,832.6 2656.84,832.76 2624.24,832.76 2607,850 2607,891 2623.24,907.24 2656.84,907.24 U2.3@2657,907.4 2657.16,907.24 C19.2@2742.6,907.24 ; C19.2@2737.25,911.8 2738.04,911.8 C19.2@2742.6,907.24 ; 3350.97,3236.03 3351.76,3236.03 ; C0-1.2@3385,3202.79 C0-1.2@3385,3202 C0-1.2@3385,3202 3385.04,3116.04 C0-2.2@3385.08,3116 C0-2.2@3385.08,3115.21
  other v1: 3289,3095 3289,3158 3288,3217
+5V_Ctrl: C0-5.2 C0-6.2 J12.45 J14.1 JP26.1 | length 707.2
  Top Layer w20: JP26.1@3583,3199 3587,3195 J14.1@3721,3195 ; C0-5.2@3768.12,3405.96 C0-5.2@3763.16,3401 3764.12,3400.04 3764.12,3322.96 C0-6.2@3765.08,3322 3765.08,3321.21 3721,3277.13 J14.1@3721,3195 ; J12.45@3794.88,2901.88 J12.45@3789,2896 3721,2964 J14.1@3721,3195
+5V_EXT: C0-3.2 C0-4.2 JP26.3 Power.1 | length 558.6
  Top Layer w20: C0-3.2@3264.92,3500 3266.42,3498.5 3266.42,3411.71 3279.13,3399 JP26.3@3583,3399 ; C0-3.2@3264.92,3500.79 3264.92,3575.92 3310,3621 Power.1@3310,3630
-2.5V: C0-9.2 C59-2.2 L5.1 U4-2.5 | length 315.3
  Top Layer w20: U4-2.5@2916.49,615 2916.49,687.65 2909.92,694.21 C59-2.2@2909.92,695 2909.46,695.46 2909.46,803.25 2944.71,838.5 L5.1@3019,838.5
-5V: C57-2.2 C59-1.2 U4-1.5 U4-2.2 U4-2.3 | length 432.7
  Top Layer w20: U4-1.5@2477,461 2607.47,461 2653,506.53 C59-1.2@2653,515.61 2708.51,515.61 2741.25,548.35 2741.25,549.12 2746.21,554.08 C57-2.2@2747,554.08 2747.79,554.08 2761.67,540.2 U4-2.3@2822,540.2 2822.16,540.35 2822,540.35 U4-2.2@2822,577.6
AGND: A1.2 C0-1.1 C0-2.1 C0-7.1 C0-8.1 C0-9.1 C0-10.1 C1-1.1 C2-1.2 C3-1.1 C4-1.2 C5-1.1 C6-1.2 C7-1.1 C8-1.2 C9-1.1 C10-1.2 C11-1.1 C12-1.2 C13-1.1 C14-1.2 C15-1.1 C16-1.2 C17-1.1 C17-2.1 C17.1 C18.2 C19.1 C20.1 C21.1 C22.1 C32.1 C33.1 C37.1 C38.2 C48-1.1 C48.1 C49-1.1 C49.1 C50.1 C51.1 C54-1.1 C54-2.1 C55-1.1 C55-2.1 C57-2.1 C58-1.2 C58-2.1 C59-1.1 C59-2.1 C62-1.1 C62-2.2 C63-1.1 C63-2.2 D1.K H1.1 H2.1 JP10.4 JP11.1 JP12.3 JP14.1 L2.2 L3.1 U1.31 U1.33 U1.49 U1.51 U1.64 U2.2 U2.4 U3.2 U3.4 U4-1.3 U4-1.6 U4-2.1 U5.2 U5.4 U6.2 U6.4 X1.2 | length 7354.4
  Top Layer w10: v1(1747,2311) 1748.91,2312.91 1773.82,2312.91 1819.31,2267.42 1833.52,2267.42 1834.36,2266.58 U1.64@1834.36,2252.37 ; U1.51@2090,2252.1 U1.51@2090.27,2252.37 2090.62,2252.72 2090.62,2293.24 2102.12,2304.74 2117.78,2304.74 2129.29,2293.23 ; U1.31@2109.95,1799.63 2109.95,1860.95 2127.36,1878.36 U1.33@2208.37,1878.36 2293.85,1878.36 2312.21,1860 C33.1@2313,1860 ; v1(2207,2253) 2130.27,2253 U1.49@2129.64,2252.37 2129.64,2301.64 2158,2330 2222,2330 2235.92,2343.92 C55-2.1@2235.92,2376
  Top Layer w20: v2(799,2304) 801.97,2306.97 C10-1.2@881.08,2306.97 C9-1.1@881.08,2389.58 ; v2(801,1732) 804.32,1728.68 C13-1.1@881.08,1728.68 C14-1.2@881.08,1646.06 ; v2(801,2058) 802.13,2059.13 C11-1.1@881.08,2059.13 C12-1.2@881.08,1976.52 ; v2(804,2635) 806.42,2637.42 C8-1.2@881.08,2637.42 C7-1.1@881.08,2720.03 ; v2(804,2968) 804.13,2967.87 C6-1.2@881.08,2967.87 C5-1.1@881.08,3050.48 ; v2(805,3300) 806.68,3298.32 C4-1.2@881.08,3298.32 C3-1.1@881.08,3380.94 ; v2(808,3624) 812.77,3628.77 C2-1.2@881.08,3628.77 C1-1.1@881.08,3711.39 ; v2(819,1453) 820,1452 828.09,1452 881.08,1399.01 C15-1.1@881.08,1398.23 C16-1.2@881.08,1315.61 ; C17.1@883.21,648.92 C17.1@884,648.92 884.5,648.42 966.5,648.42 C62-1.1@967,647.92 967.79,647.92 983.79,631.92 C17-1.1@1240,631.92 1240,726 v1(1249,735) ; v1(1085,677) 1088.21,680.21 1088.21,742.12 1089,742.91 C17-2.1@1089,747.08 ; C62-2.2@1125,89.08 1129.96,84.12 1149.84,84.12 1150.96,83 1428.13,83 1456.21,111.08 C18.2@1457,111.08 1556.08,111.08 v1(1557,112) ; C0-7.1@2149.92,960 2151.46,958.46 2151.46,822.38 C0-8.1@2153,820.84 ; U4-1.3@2157,511 U4-1.6@2477,511 2554,511 v1(2556,509) ; JP12.3@2187,3010 2189,3012 v1(2318,3012) ; C51.1@2192.2,3533.67 U6.4@2192.2,3604.51 ; JP12.3@2195,2990 JP12.3@2200,2985 ; C51.1@2202.08,3523 2202.08,3522.21 2168.83,3488.97 2168.05,3488.97 2147,3467.92 C54-2.1@2147,3429.92 2201.92,3429.92 v1(2203,3431) ; U6.2@2229.6,3699 2229.6,3752.97 2259.84,3783.21 C48.1@2259.84,3784 2262.34,3781.5 2377.25,3781.5 D1.K@2379.74,3779 2379.74,3855.26 v1(2377,3858) ; C55-2.1@2235.92,2376 C55-1.1@2235.92,2454 ; 2276,709 2278,707 C58-1.2@2362.61,707 ; C33.1@2315,1858.79 2315.79,1858 v1(2400,1858) ; C48-1.1@2365,2219.08 C49-1.1@2448,2219.08 v1(2554.08,2219.08) ; C63-1.1@2375.92,2779 C54-1.1@2375.92,2700 C32.1@2375.92,2622 C63-2.2@2375.92,2547 v1(2461,2547) ; C22.1@2487,1070.92 2487.79,1070.92 2494.67,1077.8 U3.4@2569.51,1077.8 2579.04,1077.8 2579.2,1077.65 2579.2,1075.52 2614.31,1040.4 U3.2@2664,1040.4 2715.89,1040.4 2739.21,1017.08 C21.1@2740,1017.08 2870.92,1017.08 JP14.1@2884,1004 ; C20.1@2489,897.84 2489.79,897.84 2499.35,907.4 U2.4@2562.51,907.4 ; C49.1@2491.2,3534.67 U5.4@2491.2,3609.51 ; v1(2499,3472) 2500.08,3473.08 C49.1@2500.08,3525 ; v1(2509.25,3048.25) 2631.04,3048.25 2631.04,3049.04 C37.1@2626.08,3054 2625.31,3054.77 2625.31,3139.89 X1.2@2624.54,3140.66 2620.37,3144.83 2544.17,3144.83 C38.2@2540,3149 ; v1(2528,1334) JP10.4@2528,1509 ; U5.2@2528.6,3704 2528.6,3763.97 2549.84,3785.21 C50.1@2549.84,3786 2549.84,3863.16 v1(2549,3864) ; v1(2562,645) 2565,648 2652.61,648 C59-1.1@2653,648.39 ; C59-1.1@2653,639.31 2678.38,613.92 C57-2.1@2747,613.92 2811.39,613.92 2812.47,615 U4-2.1@2822,615 ; U2.2@2657,870 2657.16,869.84 2677.57,869.84 2700.41,847 C19.1@2743,847 2743.79,847 2788.79,802 C0-9.1@2849.16,802 2849.62,801.54 2849.62,695.46 C59-2.1@2850.08,695 2851,694.08 2851,649 ; 2956,1076 2956,1122 2957,1123 ; C58-2.1@2995,605.92 2995.79,605.92 3030.94,641.08 C0-10.1@3118,641.08 ; v1(3443,3007) 3444.92,3008.92 C0-2.1@3444.92,3116 C0-2.1@3444.92,3116 3444.88,3201.96 C0-1.1@3444.84,3202 C0-1.1@3444.84,3201.21
  other v1: 2088,406 2085,539 3276.04,698.67 3277.04,766.67 3076,772 3180.58,793 3276.04,840.67 3178.58,883 2860,922 2899,922 2937,922 3070,928 3173.58,964 2937,1101 2860,1102 2897,1102 3071.42,3258 3129,3258 3196.96,3258
AIN1: JP1.2 R1-1.1 | length 785.7
  Top Layer w10: JP1.2@572,3152 572,3484.13 881.08,3793.21 R1-1.1@881.08,3794 ; R1-1.1@874.33,3783.25 875.12,3783.25 885.08,3793.21 R1-1.1@885.08,3794
AIN2: JP1.4 R2-1.1 | length 622.2
  Top Layer w10: JP1.4@572,3052 728.14,3208.14 728.14,3392.43 881.08,3545.37 R2-1.1@881.08,3546.16
AIN3: JP1.6 R3-1.1 | length 640.4
  Top Layer w10: JP1.6@572,2952 746.14,3126.14 746.14,3327.82 881.08,3462.76 R3-1.1@881.08,3463.55 ; R3-1.1@892,3456.21 R3-1.1@892,3457
AIN4: JP1.8 R4-1.1 | length 492.2
  Top Layer w10: JP1.8@572,2852 765,3045 765,3099.63 870.33,3204.96 871.12,3204.96 881.08,3214.92 R4-1.1@881.08,3215.71
AIN5: JP1.10 R5-1.1 | length 509.1
  Top Layer w10: JP1.10@572,2752 728.14,2908.14 728.14,2979.37 881.08,3132.31 R5-1.1@881.08,3133.1
AIN6: JP1.12 R6-1.1 | length 405.7
  Top Layer w10: JP1.12@572,2652 805.26,2885.26 R6-1.1@881.08,2885.26
AIN7: JP1.14 R7-1.1 | length 413.4
  Top Layer w10: JP1.14@572,2552 631.22,2552 881.08,2801.86 R7-1.1@881.08,2802.65
AIN8: JP1.16 R8-1.1 | length 352.1
  Top Layer w10: JP1.16@572,2452 779.06,2452 881.08,2554.02 R8-1.1@881.08,2554.81
AIN9: JP1.18 R9-1.1 | length 359.3
  Top Layer w10: JP1.18@572,2352 761.67,2352 881.08,2471.41 R9-1.1@881.08,2472.19
AIN10: JP1.20 R10-1.1 | length 321
  Top Layer w10: JP1.20@572,2252 854.22,2252 881.08,2225.14 R10-1.1@881.08,2224.35
AIN11: JP1.22 R11-1.1 | length 313.5
  Top Layer w10: JP1.22@572,2152 871.12,2152 881.08,2142.04 R11-1.1@881.08,2141.74
AIN12: JP1.24 R12-1.1 | length 375
  Top Layer w10: JP1.24@572,2052 723.77,2052 881.08,1894.69 R12-1.1@881.08,1893.9
AIN13: JP1.26 R13-1.1 | length 367.8
  Top Layer w10: JP1.26@572,1952 741.16,1952 881.08,1812.08 R13-1.1@881.08,1811.29
AIN14: JP1.28 R14-1.1 | length 429.1
  Top Layer w10: JP1.28@572,1852 849.8,1574.2 871.12,1574.2 881.08,1564.24 R14-1.1@881.08,1563.45
AIN15: JP1.30 R15-1.1 | length 421.4
  Top Layer w10: JP1.30@572,1752 843.16,1480.84 R15-1.1@881.08,1480.84
AIN16: JP1.32 R16-1.1 | length 562.9
  Top Layer w10: JP1.32@572,1652 572,1633.4 588.95,1616.45 588.95,1612.05 822,1379 822,1265 854,1233 R16-1.1@881.08,1233
AVDD: C0-7.2 C17-1.2 C19-1.2 C19-2.2 C21-1.2 C21-2.2 C23.2 C53-1.2 C53-2.2 C54-1.2 C54-2.2 C56-1.2 C56-2.2 C62-1.2 C63-1.2 L4.1 R21.2 R60-1.1 R62-1.2 TP2.1 U1.19 U1.21 U1.22 U1.54 U1.56 U1.59 U7.5 U8.7 U9.7 | length 3213.5
  Top Layer w10: v1(1850,1917) 1873.73,1893.27 U1.19@1873.73,1799.63 ; v1(1884,2147) 1932.79,2195.79 U1.59@1932.79,2252.37 ; U1.22@1932.79,1799.63 1932.79,1751.77 ; v1(1935,1917) 1932.29,1917 1920.47,1905.17 1920.17,1905.17 1913.1,1898.1 U1.21@1913.1,1799.63 1913.1,1757.63 1918.96,1751.77 1932.79,1751.77 ; C19-1.2@1964.92,1671 1964.92,1671.79 1932.79,1703.92 1932.79,1751.77 ; v1(1978,2334) 1991.84,2320.16 1991.84,2195.62 1998.3,2189.16 2025.35,2189.16 2031.21,2195.02 U1.54@2031.21,2252.37
  Top Layer w20: v1(907,368) 909,370 U9.7@909,464 909,530.87 966.21,588.08 C62-1.2@967,588.08 972.67,588.08 C62-1.2@972.75,588 ; v1(1173,572) 1173.08,572.08 C17-1.2@1240,572.08 1240,521.08 1263,498.08 U8.7@1263,465 ; R62-1.2@1455,472.92 1455,579 v1(1459,583) ; v1(1759,772) 1865,878 L4.1@2031,878 2038.5,878 2085.12,924.62 2085.12,955.04 C0-7.2@2090.08,960 2089.58,960.5 C23.2@2089.58,1037 ; v1(1779,3001) 1780.2,2999.8 U7.5@1780.2,2890 ; v1(1905,3371) 1905.92,3370.08 C53-2.2@2069,3370.08 C54-2.2@2147,3370.08 ; C21-1.2@1916,1467.92 C21-2.2@1992.21,1467.92 ; C19-1.2@1964.92,1671 C19-2.2@1964.92,1588 1964.92,1495.21 C21-2.2@1992.21,1467.92 ; R21.2@1970,993.08 2003.11,993.11 2047,1037 C23.2@2089.08,1037 2089.08,1101.1 2062,1128.18 TP2.1@2062,1139 ; C21-2.2@1993,1467.92 C21-2.2@1992.21,1467.92 ; C53-1.2@2177,2674 C53-1.2@2177,2674 2177.04,2747.96 C56-2.2@2177.08,2748 2177.58,2748.5 2177.58,2824.5 C56-1.2@2178.08,2825 v1(2178.08,2904.92) ; C54-1.2@2316.08,2700 C63-1.2@2316.08,2779 v1(2316.08,2902.92)